# Allegro board GEN-LB-20261108-G1.brd
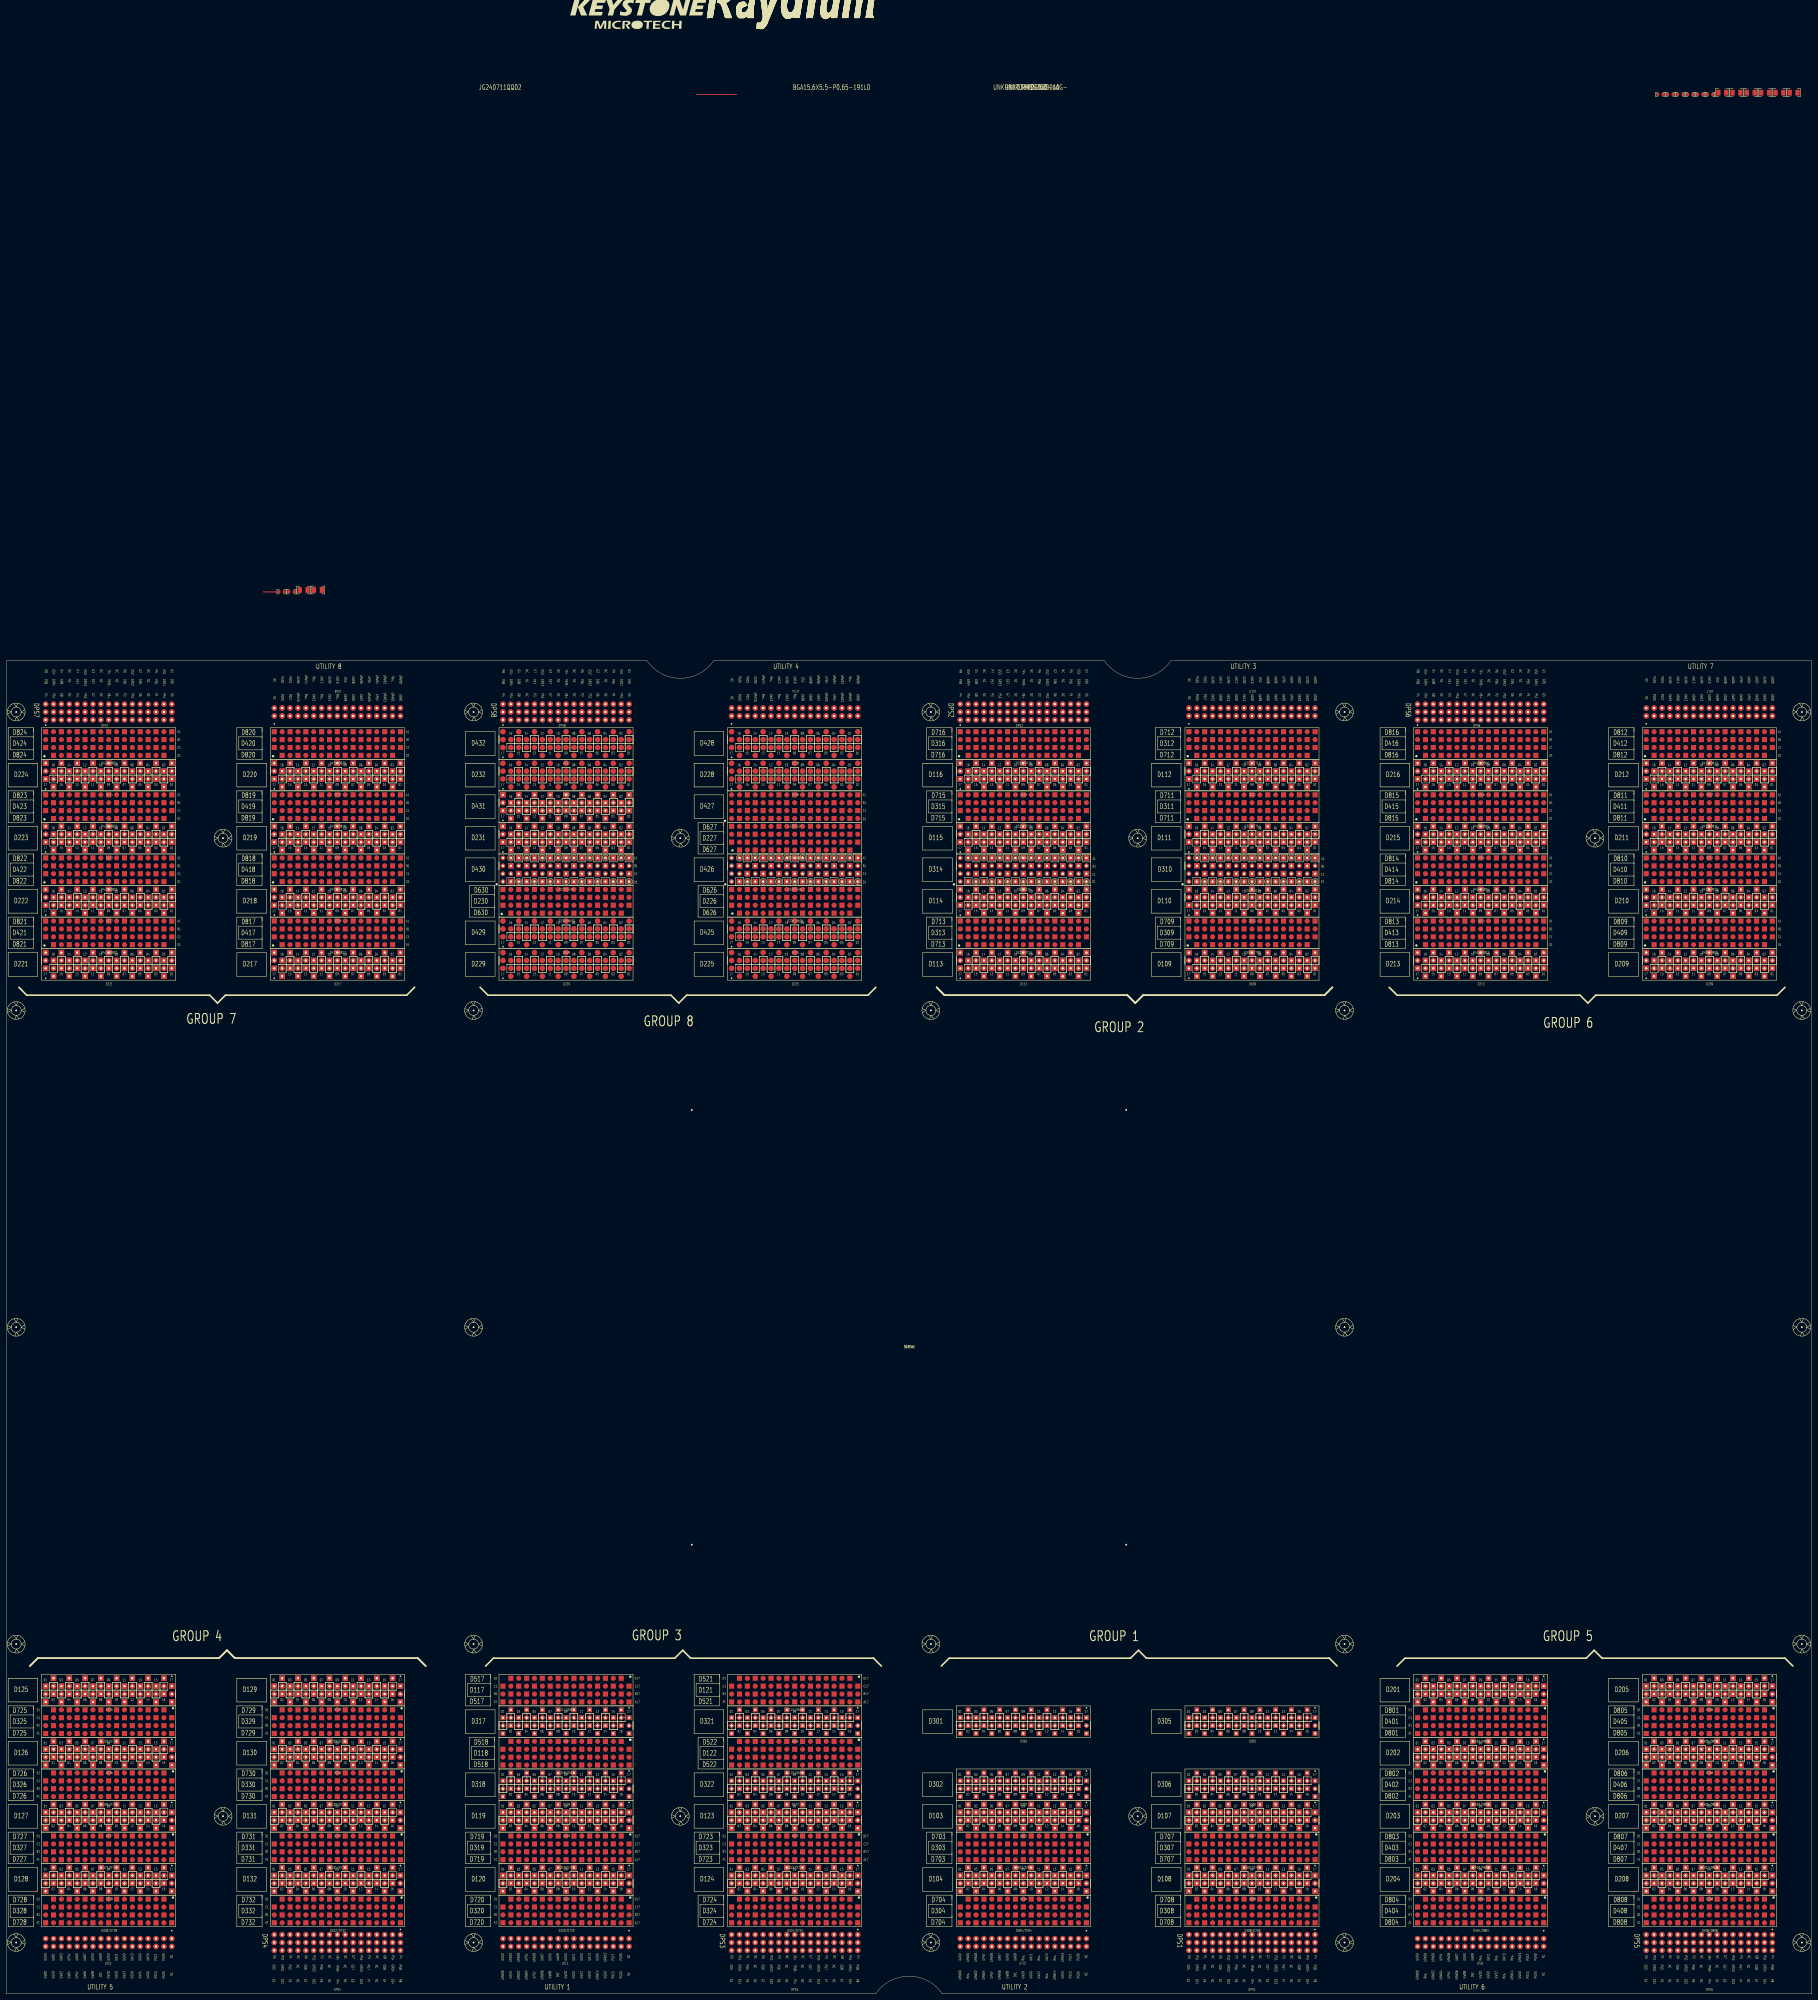
[diagram p0: board, top side]
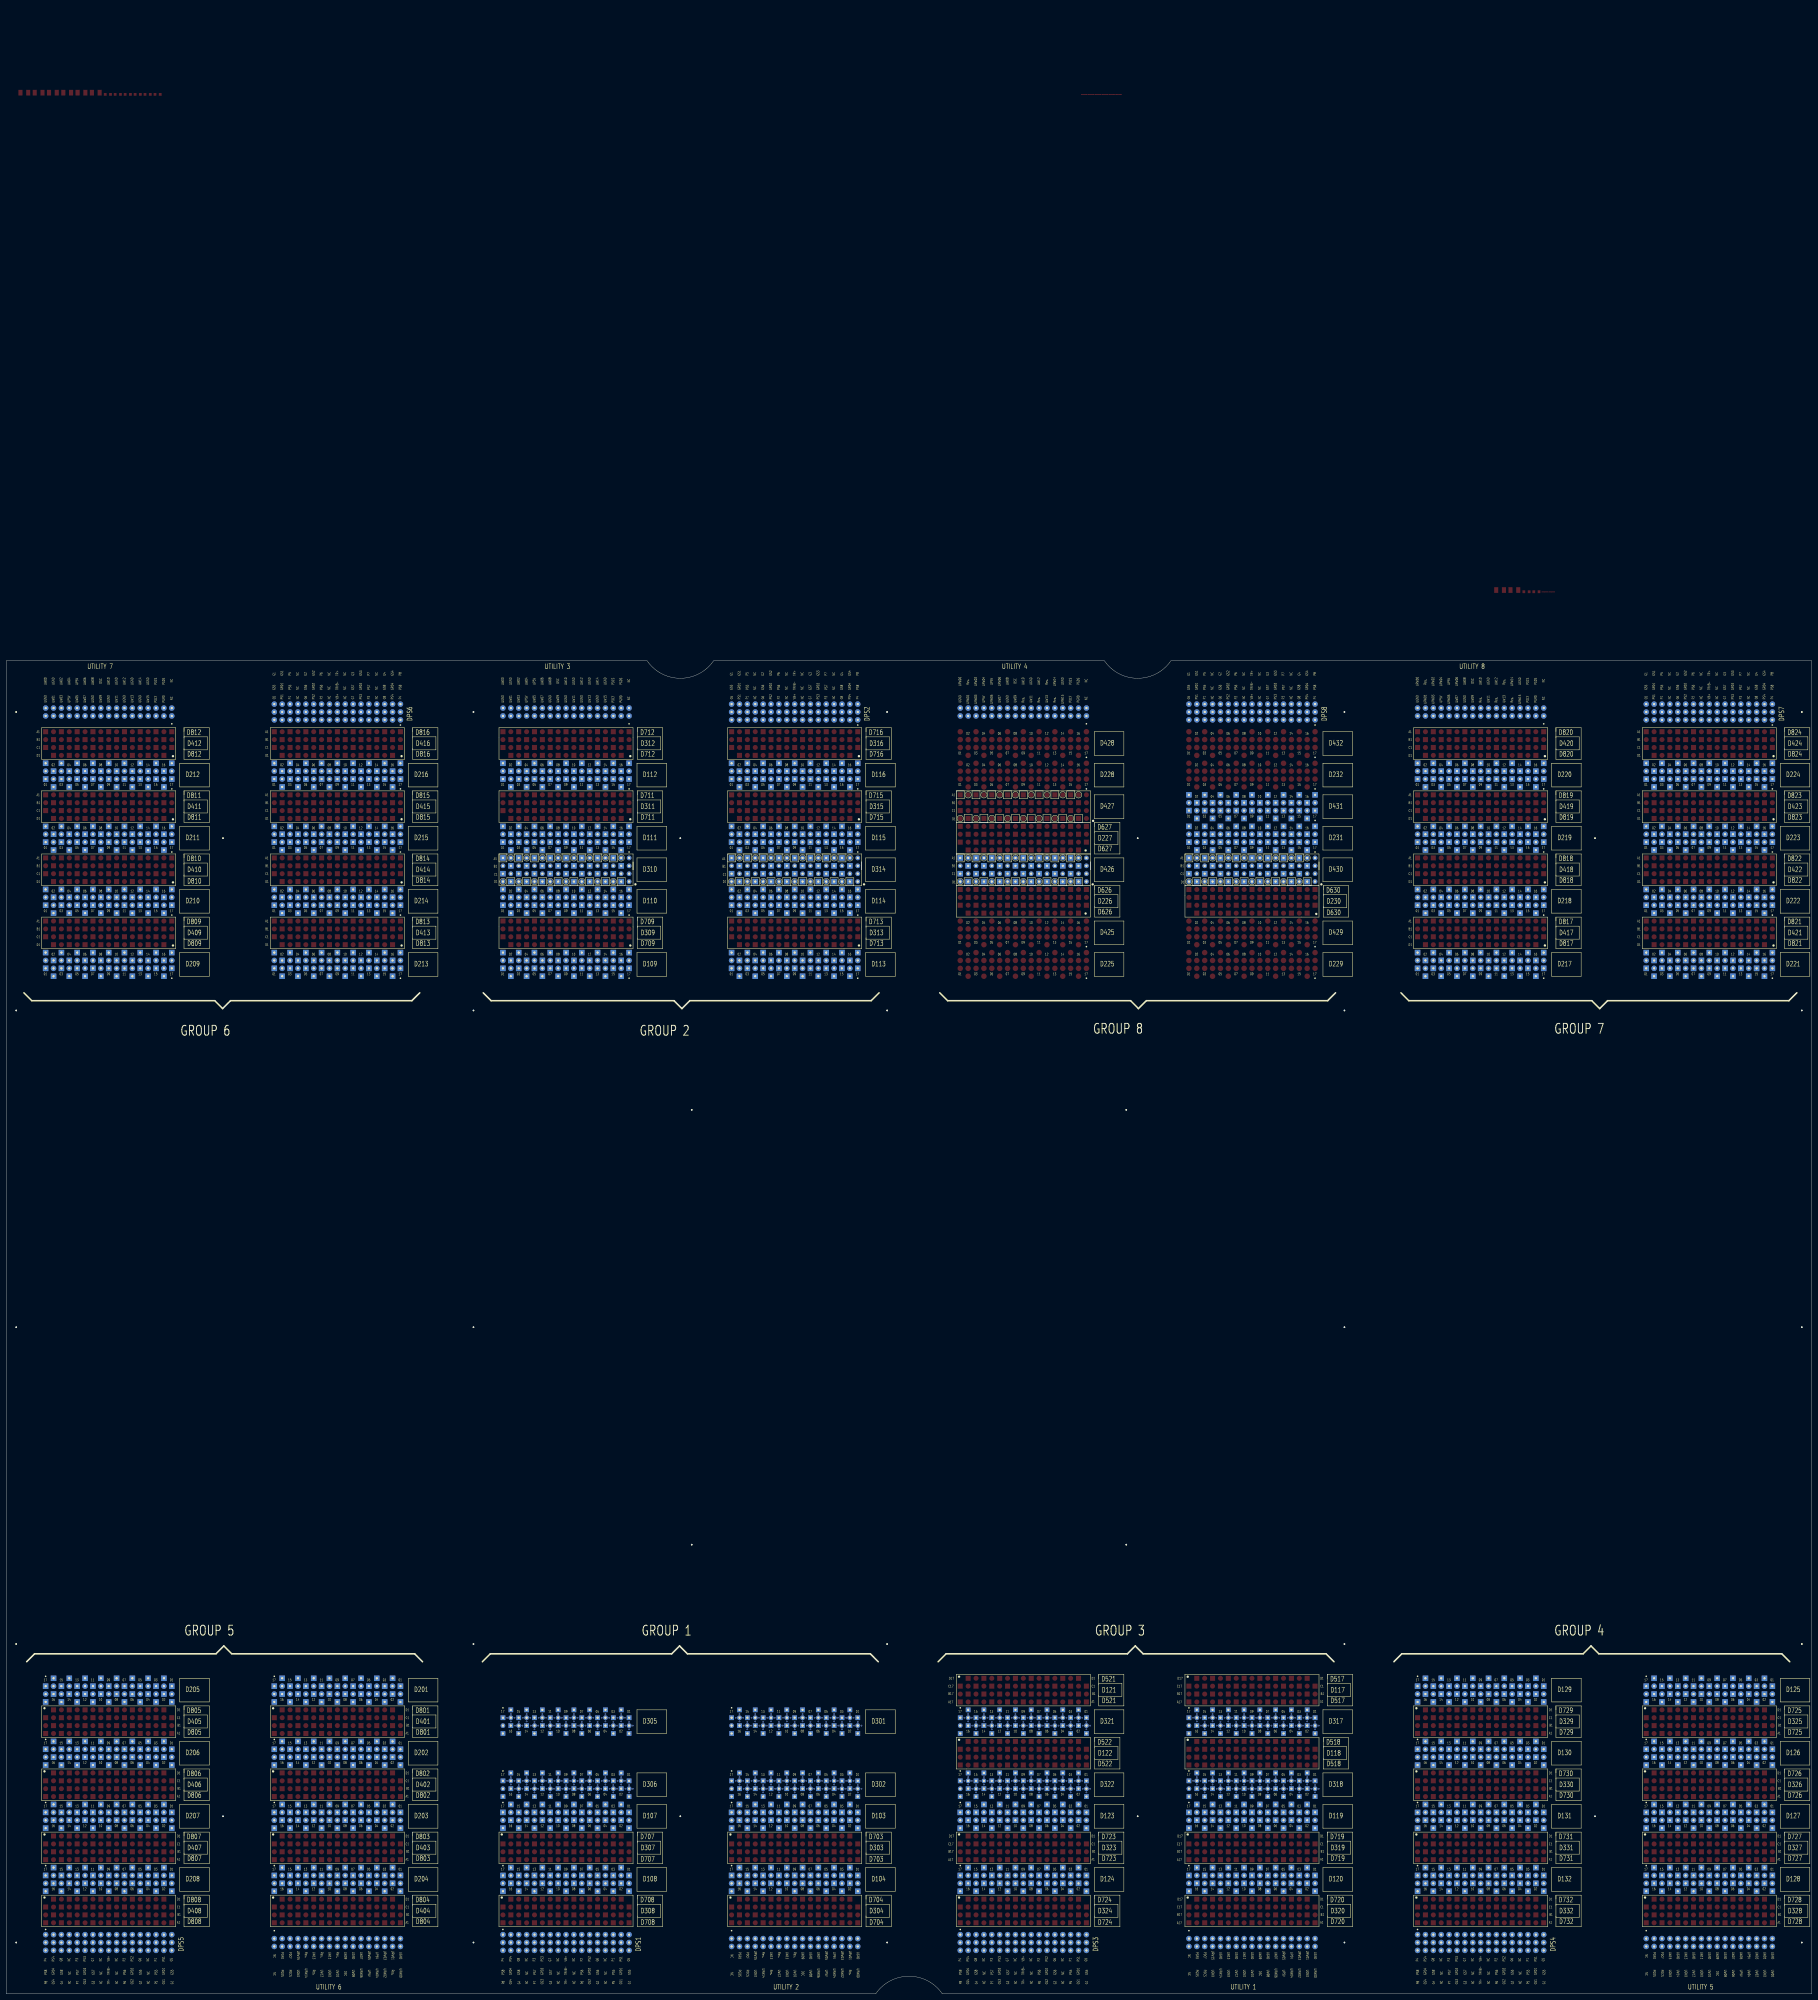
[diagram p1: board, bottom side, seen from below]

Outline 581.66 x 429.26 mm; copper layers: TOP, L02_DGND, L03_DIG, L04_DGND, L05_DIG, L06_DGND, L07_DIG, L08_DGND, L09_DIG, L10_DGND, L11_DPS, L12_DGND, L13_CBIT_5V, L14_DGND, L15_DPS, L16_DPS, L17_DGND, L18_DPS, L19_DGND, L20_DIG, L21_DGND, L22_DIG, L23_DGND, L24_DIG, L25_DGND, BOTTOM. Coordinates in mm from the lower left corner of the outline.

## Placement (name value [footprint] x y rotation side)
BGA15.6X5.5-P0.65-191LD  REF-CODE-CHIP  [CHIP_CODE]  265.72 614.04 0 top
CB1  0.1U-25-X-S6  [C0603]  532.89 611.63 0 top
CB2  10U-25-X7R-SA  [C1206]  562.02 612.18 0 top
CB3  0.1U-25-X-S6  [C0603]  539.3 611.63 0 top
CB4  10U-25-X7R-SA  [C1206]  566.62 612.18 0 top
CB5  0.1U-25-X-S6  [C0603]  542.5 611.63 0 top
CB6  10U-25-X7R-SA  [C1206]  571.22 612.18 0 top
CB7  0.1U-25-X-S6  [C0603]  545.7 611.63 0 top
CB8  10U-25-X7R-SA  [C1206]  575.83 612.18 0 top
CB9  0.1U-25-X-S6  [C0603]  548.91 611.63 0 top
CB10  10U-25-X7R-SA  [C1206]  552.81 612.18 0 top
CB11  0.1U-25-X-S6  [C0603]  88.71 451.48 0 top
CB12  10U-25-X7R-SA  [C1206]  95.81 452.03 0 top
CB13  0.1U-25-X-S6  [C0603]  91.91 451.48 0 top
CB14  10U-25-X7R-SA  [C1206]  100.42 452.03 0 top
CB15  0.1U-25-X-S6  [C0603]  536.09 611.63 0 top
CB16  10U-25-X7R-SA  [C1206]  557.41 612.18 0 top
CSDPS310  V93K_CSDPS_DPS32  [PG_VG93K_PF_DPS32_G2D310]  401.32 361.95 0 top
CSDPS314  V93K_CSDPS_DPS32  [PG_VG93K_PF_DPS32_G2D314]  327.66 361.95 0 top
CSDPS426  V93K_CSDPS  [PG_VG93K_PF_DPS32_G8D426]  254 361.95 0 top
CSDPS427  V93K_CSDPS_DPS32  [PG_VG93K_PF_DPS32_G8D427_ND]  254 382.27 0 top
CSDPS430  V93K_CSDPS_DPS32  [PG_VG93K_PF_DPS32_G8D430]  180.34 361.95 0 top
D103  V93K_CH  [PG_VG93K_F_G1D103]  327.66 57.15 0 top
D104  V93K_CH  [PG_VG93K_F_G1D104]  327.66 36.83 0 top
D107  V93K_CH  [PG_VG93K_F_G1D107]  401.32 57.15 0 top
D108  V93K_CH  [PG_VG93K_F_G1D108]  401.32 36.83 0 top
D109  V93K_CH  [PG_VG93K_F_G2D109]  401.32 331.47 0 top
D110  V93K_CH  [PG_VG93K_F_G2D110]  401.32 351.79 0 top
D111  V93K_CH  [PG_VG93K_F_G2D111]  401.32 372.11 0 top
D112  V93K_CH  [PG_VG93K_F_G2D112]  401.32 392.43 0 top
D113  V93K_CH  [PG_VG93K_F_G2D113]  327.66 331.47 0 top
D114  V93K_CH  [PG_VG93K_F_G2D114]  327.66 351.79 0 top
D115  V93K_CH  [PG_VG93K_F_G2D115]  327.66 372.11 0 top
D116  V93K_CH  [PG_VG93K_F_G2D116]  327.66 392.43 0 top
D117/D517  V93K_PS1600 HD  [PG_VG93K_F_HSM_G3D117_517_ND]  180.34 97.79 0 top
D118/D518  V93K_PS1600 HD  [PG_VG93K_F_HSM_G3D118_518_ND]  180.34 77.47 0 top
D119  V93K_CH  [PG_VG93K_F_G3D119]  180.34 57.15 0 top
D120  V93K_CH  [PG_VG93K_F_G3D120]  180.34 36.83 0 top
D121/D521  V93K_PS1600 HD  [PG_VG93K_F_HSM_G3D121_521_ND]  254 97.79 0 top
D122/D522  V93K_PS1600 HD  [PG_VG93K_F_HSM_G3D122_522_ND]  254 77.47 0 top
D123  V93K_CH  [PG_VG93K_F_G3D123]  254 57.15 0 top
D124  V93K_CH  [PG_VG93K_F_G3D124]  254 36.83 0 top
D125  V93K_CH  [PG_VG93K_F_G4D125]  33.02 97.79 0 top
D126  V93K_CH  [PG_VG93K_F_G4D126]  33.02 77.47 0 top
D127  V93K_CH  [PG_VG93K_F_G4D127]  33.02 57.15 0 top
D128  V93K_CH  [PG_VG93K_F_G4D128]  33.02 36.83 0 top
D129  V93K_CH  [PG_VG93K_F_G4D129]  106.68 97.79 0 top
D130  V93K_CH  [PG_VG93K_F_G4D130]  106.68 77.47 0 top
D131  V93K_CH  [PG_VG93K_F_G4D131]  106.68 57.15 0 top
D132  V93K_CH  [PG_VG93K_F_G4D132]  106.68 36.83 0 top
D201  V93K_CH  [PG_VG93K_F_G5D201]  474.98 97.79 0 top
D202  V93K_CH  [PG_VG93K_F_G5D202]  474.98 77.47 0 top
D203  V93K_CH  [PG_VG93K_F_G5D203]  474.98 57.15 0 top
D204  V93K_CH  [PG_VG93K_F_G5D204]  474.98 36.83 0 top
D205  V93K_CH  [PG_VG93K_F_G5D205]  548.64 97.79 0 top
D206  V93K_CH  [PG_VG93K_F_G5D206]  548.64 77.47 0 top
D207  V93K_CH  [PG_VG93K_F_G5D207]  548.64 57.15 0 top
D208  V93K_CH  [PG_VG93K_F_G5D208]  548.64 36.83 0 top
D209  V93K_CH  [PG_VG93K_F_G6D209]  548.64 331.47 0 top
D210  V93K_CH  [PG_VG93K_F_G6D210]  548.64 351.79 0 top
D211  V93K_CH  [PG_VG93K_F_G6D211]  548.64 372.11 0 top
D212  V93K_CH  [PG_VG93K_F_G6D212]  548.64 392.43 0 top
D213  V93K_CH  [PG_VG93K_F_G6D213]  474.98 331.47 0 top
D214  V93K_CH  [PG_VG93K_F_G6D214]  474.98 351.79 0 top
D215  V93K_CH  [PG_VG93K_F_G6D215]  474.98 372.11 0 top
D216  V93K_CH  [PG_VG93K_F_G6D216]  474.98 392.43 0 top
D217  V93K_CH  [PG_VG93K_F_G7D217]  106.68 331.47 0 top
D218  V93K_CH  [PG_VG93K_F_G7D218]  106.68 351.79 0 top
D219  V93K_CH  [PG_VG93K_F_G7D219]  106.68 372.11 0 top
D220  V93K_CH  [PG_VG93K_F_G7D220]  106.68 392.43 0 top
D221  V93K_CH  [PG_VG93K_F_G7D221]  33.02 331.47 0 top
D222  V93K_CH  [PG_VG93K_F_G7D222]  33.02 351.79 0 top
D223  V93K_CH  [PG_VG93K_F_G7D223]  33.02 372.11 0 top
D224  V93K_CH  [PG_VG93K_F_G7D224]  33.02 392.43 0 top
D225  V93K_CH_ND  [PG_VG93K_F_G8D225_ND]  254 331.47 0 top
D226/D626  V93K_PS1600 HD  [PG_VG93K_F_HSM_G8D226_626_ND]  254 351.79 0 top
D227/D627  V93K_PS1600 HD  [PG_VG93K_F_HSM_G8D227_627_ND]  254 372.11 0 top
D228  V93K_CH_ND  [PG_VG93K_F_G8D228_ND]  254 392.43 0 top
D229  V93K_CH_ND  [PG_VG93K_F_G8D229_ND]  180.34 331.47 0 top
D230/D630  V93K_PS1600 HD  [PG_VG93K_F_HSM_G8D230_630_ND]  180.34 351.79 0 top
D231  V93K_CH  [PG_VG93K_F_G8D231]  180.34 372.11 0 top
D232  V93K_CH_ND  [PG_VG93K_F_G8D232_ND]  180.34 392.43 0 top
D301  V93K_CH  [PG_VG93K_F_G1D301]  327.66 87.63 0 top
D302  V93K_CH  [PG_VG93K_F_G1D302]  327.66 67.31 0 top
D303/D703  V93K_PS1600 HD  [PG_VG93K_F_HSM_G1D303_703_ND]  327.66 46.99 0 top
D304/D704  V93K_PS1600 HD  [PG_VG93K_F_HSM_G1D304_704_ND]  327.66 26.67 0 top
D305  V93K_CH  [PG_VG93K_F_G1D305]  401.32 87.63 0 top
D306  V93K_CH  [PG_VG93K_F_G1D306]  401.32 67.31 0 top
D307/D707  V93K_PS1600 HD  [PG_VG93K_F_HSM_G1D307_707_ND]  401.32 46.99 0 top
D308/D708  V93K_PS1600 HD  [PG_VG93K_F_HSM_G1D308_708_ND]  401.32 26.67 0 top
D309/D709  V93K_PS1600 HD  [PG_VG93K_F_HSM_G2D309_709_ND]  401.32 341.63 0 top
D311/D711  V93K_PS1600 HD  [PG_VG93K_F_HSM_G2D311_711_ND]  401.32 382.27 0 top
D312/D712  V93K_PS1600 HD  [PG_VG93K_F_HSM_G2D312_712_ND]  401.32 402.59 0 top
D313/D713  V93K_PS1600 HD  [PG_VG93K_F_HSM_G2D313_713_ND]  327.66 341.63 0 top
D315/D715  V93K_PS1600 HD  [PG_VG93K_F_HSM_G2D315_715_ND]  327.66 382.27 0 top
D316/D716  V93K_PS1600 HD  [PG_VG93K_F_HSM_G2D316_716_ND]  327.66 402.59 0 top
D317  V93K_CH  [PG_VG93K_F_G3D317]  180.34 87.63 0 top
D318  V93K_CH  [PG_VG93K_F_G3D318]  180.34 67.31 0 top
D319/D719  V93K_PS1600 HD  [PG_VG93K_F_HSM_G3D319_719_ND]  180.34 46.99 0 top
D320/D720  V93K_PS1600 HD  [PG_VG93K_F_HSM_G3D320_720_ND]  180.34 26.67 0 top
D321  V93K_CH  [PG_VG93K_F_G3D321]  254 87.63 0 top
D322  V93K_CH  [PG_VG93K_F_G3D322]  254 67.31 0 top
D323/D723  V93K_PS1600 HD  [PG_VG93K_F_HSM_G3D323_723_ND]  254 46.99 0 top
D324/D724  V93K_PS1600 HD  [PG_VG93K_F_HSM_G3D324_724_ND]  254 26.67 0 top
D325/D725  V93K_PS1600 HD  [PG_VG93K_F_HSM_G4D325_725_ND]  33.02 87.63 0 top
D326/D726  V93K_PS1600 HD  [PG_VG93K_F_HSM_G4D326_726_ND]  33.02 67.31 0 top
D327/D727  V93K_PS1600 HD  [PG_VG93K_F_HSM_G4D327_727_ND]  33.02 46.99 0 top
D328/D728  V93K_PS1600 HD  [PG_VG93K_F_HSM_G4D328_728_ND]  33.02 26.67 0 top
D329/D729  V93K_PS1600 HD  [PG_VG93K_F_HSM_G4D329_729_ND]  106.68 87.63 0 top
D330/D730  V93K_PS1600 HD  [PG_VG93K_F_HSM_G4D330_730_ND]  106.68 67.31 0 top
D331/D731  V93K_PS1600 HD  [PG_VG93K_F_HSM_G4D331_731_ND]  106.68 46.99 0 top
D332/D732  V93K_PS1600 HD  [PG_VG93K_F_HSM_G4D332_732_ND]  106.68 26.67 0 top
D401/D801  V93K_PS1600 HD  [PG_VG93K_F_HSM_G5D401_801_ND]  474.98 87.63 0 top
D402/D802  V93K_PS1600 HD  [PG_VG93K_F_HSM_G5D402_802_ND]  474.98 67.31 0 top
D403/D803  V93K_PS1600 HD  [PG_VG93K_F_HSM_G5D403_803_ND]  474.98 46.99 0 top
D404/D804  V93K_PS1600 HD  [PG_VG93K_F_HSM_G5D404_804_ND]  474.98 26.67 0 top
D405/D805  V93K_PS1600 HD  [PG_VG93K_F_HSM_G5D405_805_ND]  548.64 87.63 0 top
D406/D806  V93K_PS1600 HD  [PG_VG93K_F_HSM_G5D406_806_ND]  548.64 67.31 0 top
D407/D807  V93K_PS1600 HD  [PG_VG93K_F_HSM_G5D407_807_ND]  548.64 46.99 0 top
D408/D808  V93K_PS1600 HD  [PG_VG93K_F_HSM_G5D408_808_ND]  548.64 26.67 0 top
D409/D809  V93K_PS1600 HD  [PG_VG93K_F_HSM_G6D409_809_ND]  548.64 341.63 0 top
D410/D810  V93K_PS1600 HD  [PG_VG93K_F_HSM_G6D410_810_ND]  548.64 361.95 0 top
D411/D811  V93K_PS1600 HD  [PG_VG93K_F_HSM_G6D411_811_ND]  548.64 382.27 0 top
D412/D812  V93K_PS1600 HD  [PG_VG93K_F_HSM_G6D412_812_ND]  548.64 402.59 0 top
D413/D813  V93K_PS1600 HD  [PG_VG93K_F_HSM_G6D413_813_ND]  474.98 341.63 0 top
D414/D814  V93K_PS1600 HD  [PG_VG93K_F_HSM_G6D414_814_ND]  474.98 361.95 0 top
D415/D815  V93K_PS1600 HD  [PG_VG93K_F_HSM_G6D415_815_ND]  474.98 382.27 0 top
D416/D816  V93K_PS1600 HD  [PG_VG93K_F_HSM_G6D416_816_ND]  474.98 402.59 0 top
D417/D817  V93K_PS1600 HD  [PG_VG93K_F_HSM_G7D417_817_ND]  106.68 341.63 0 top
D418/D818  V93K_PS1600 HD  [PG_VG93K_F_HSM_G7D418_818_ND]  106.68 361.95 0 top
D419/D819  V93K_PS1600 HD  [PG_VG93K_F_HSM_G7D419_819_ND]  106.68 382.27 0 top
D420/D820  V93K_PS1600 HD  [PG_VG93K_F_HSM_G7D420_820_ND]  106.68 402.59 0 top
D421/D821  V93K_PS1600 HD  [PG_VG93K_F_HSM_G7D421_821_ND]  33.02 341.63 0 top
D422/D822  V93K_PS1600 HD  [PG_VG93K_F_HSM_G7D422_822_ND]  33.02 361.95 0 top
D423/D823  V93K_PS1600 HD  [PG_VG93K_F_HSM_G7D423_823_ND]  33.02 382.27 0 top
D424/D824  V93K_PS1600 HD  [PG_VG93K_F_HSM_G7D424_824_ND]  33.02 402.59 0 top
D425  V93K_CH_ND  [PG_VG93K_F_G8D425_ND]  254 341.63 0 top
D428  V93K_CH_ND  [PG_VG93K_F_G8D428_ND]  254 402.59 0 top
D429  V93K_CH_ND  [PG_VG93K_F_G8D429_ND]  180.34 341.63 0 top
D431  V93K_CH  [PG_VG93K_F_G8D431]  180.34 382.27 0 top
D432  V93K_CH_ND  [PG_VG93K_F_G8D432_ND]  180.34 402.59 0 top
DPS1  V93K_DPS  [PG_VG93K_F_G1DPS1]  401.32 16.51 0 top
DPS2  V93K_DPS  [PG_VG93K_F_G2DPS2]  327.66 412.75 0 top
DPS3  V93K_DPS  [PG_VG93K_F_G3DPS3]  254 16.51 0 top
DPS4  V93K_DPS  [PG_VG93K_F_G4DPS4]  106.68 16.51 0 top
DPS5  V93K_DPS  [PG_VG93K_F_G5DPS5]  548.64 16.51 0 top
DPS6  V93K_DPS  [PG_VG93K_F_G6DPS6]  474.98 412.75 0 top
DPS7  V93K_DPS  [PG_VG93K_F_G7DPS7]  33.02 412.75 0 top
DPS8  V93K_DPS  [PG_VG93K_F_G8DPS8]  180.34 412.75 0 top
JG240711QQ02  REF-CODE-SOCKET  [SOCKET_CODE]  158.97 614.04 0 top
LOGO1  -  [LOGO_KT_KSMT]  200.55 637.03 0 top
LOGO2  LOGO_RD_Rad  [LOGO_RD_RAD]  252.59 640.7 0 top
NOREF  -  []  87.86 451.03 90 top
NOREF#2  -  []  532.04 611.18 90 top
NOREF#3  -  []  548.06 611.18 90 top
NOREF#4  -  []  538.45 611.18 90 top
NOREF#5  -  []  535.24 611.18 90 top
NOREF#6  -  []  91.06 451.03 90 top
NOREF#7  -  []  541.65 611.18 90 top
NOREF#8  -  []  544.85 611.18 90 top
RM85260  REF-CODE-CHIP  [CHIP_CODE]  330.95 614.04 0 top
SB1  SHORT  [DEFAULT_SHORT_SMALL]  223.34 611.56 0 top
SB13  SHORT  [DEFAULT_SHORT_SMALL]  225.54 611.56 0 top
SB14  SHORT  [DEFAULT_SHORT_SMALL]  227.75 611.56 0 top
SB15  SHORT  [DEFAULT_SHORT_SMALL]  229.95 611.56 0 top
SB16  SHORT  [DEFAULT_SHORT_SMALL]  232.15 611.56 0 top
SB17  SHORT  [DEFAULT_SHORT_SMALL]  83.8 451.41 0 top
SB18  SHORT  [DEFAULT_SHORT_SMALL]  86 451.41 0 top
SB19  SHORT  [DEFAULT_SHORT_SMALL]  234.36 611.56 0 top
SCREW1  V93KMFHOLE  [PG_VG93K_F_FULLOUTLINE]  290.83 214.63 0 top
UNK038RD-E200A0  REF-CODE-PCB  [PCB_CODE]  330.34 614.04 0 top
UNK980RD-E200A0-1AG-  REF-CODE-PCB  [PCB_CODE]  329.73 614.04 0 top
UTL1  V93K_UTL  [PG_VG93K_F_G3UTI1]  180.34 16.51 0 top
UTL2  V93K_UTL  [PG_VG93K_F_G1UTI2]  327.66 16.51 0 top
UTL3  V93K_UTL  [PG_VG93K_F_G2UTI3]  401.32 412.75 0 top
UTL4  V93K_UTL  [PG_VG93K_F_G8UTI4]  254 412.75 0 top
UTL5  V93K_UTL  [PG_VG93K_F_G4UTI5]  33.02 16.51 0 top
UTL6  V93K_UTL  [PG_VG93K_F_G5UTI6]  474.98 16.51 0 top
UTL7  V93K_UTL  [PG_VG93K_F_G6UTI7]  548.64 412.75 0 top
UTL8  V93K_UTL  [PG_VG93K_F_G7UTI8]  106.68 412.75 0 top

## Library data of the parts
BGA15.6X5.5-P0.65-191LD RM85260 = REF-CODE-CHIP
CB1 CB3 CB5 CB7 CB9 CB11 CB13 CB15 = 0.1U-25-X-S6: User Part Number: PNXXXXXXXXXX; Tolerance: TOL
CB2 CB4 CB6 CB8 CB10 CB12 CB14 CB16 = 10U-25-X7R-SA: User Part Number: PNXXXXXXXXXX; Tolerance: TOL
CSDPS310 CSDPS314 = V93K_CSDPS_DPS32: Tolerance: TOL; User Part Number: PNXXXXXXXXXX
CSDPS426 = V93K_CSDPS_A: User Part Number: PNXXXXXXXXXX; Tolerance: TOL
CSDPS427 CSDPS430 = V93K_CSDPS_DPS32: User Part Number: PNXXXXXXXXXX; Tolerance: TOL
D103 D104 D107-D116 D119 D120 D123-D132 D201-D225 D228 D229 D231 D232 D301 D302 D305 D306 D317 D318 D321 D322 D425 D428 D429 D431 D432 = V93K_CH: Tolerance: TOL; User Part Number: PNXXXXXXXXXX
D117/D517 D118/D518 D121/D521 D122/D522 D226/D626 D227/D627 D230/D630 D303/D703 D304/D704 D307/D707 D308/D708 D309/D709 D311/D711 D312/D712 D313/D713 D315/D715 D316/D716 D319/D719 D320/D720 D323/D723 D324/D724 D325/D725 D326/D726 D327/D727 D328/D728 D329/D729 D330/D730 D331/D731 D332/D732 D401/D801 D402/D802 D403/D803 D404/D804 D405/D805 D406/D806 D407/D807 D408/D808 D409/D809 D410/D810 D411/D811 D412/D812 D413/D813 D414/D814 D415/D815 D416/D816 D417/D817 D418/D818 D419/D819 D420/D820 D421/D821 D422/D822 D423/D823 D424/D824 = V93K_PS1600_HD: User Part Number: PNXXXXXXXXXX; Tolerance: TOL
DPS1-DPS8 = V93K_DPS: Tolerance: TOL; User Part Number: PNXXXXXXXXXX
JG240711QQ02 = REF-CODE-SOCKET
LOGO1 = LOGO_KT_KSMT
LOGO2 = LOGO_RD_Rad
SB1 SB13-SB19 = SHORT: User Part Number: PNXXXXXXXXXX; Tolerance: TOL
SCREW1 = V93KMFHOLE: Tolerance: TOL; User Part Number: PNXXXXXXXXXX
UNK038RD-E200A0 UNK980RD-E200A0-1AG- = REF-CODE-PCB
UTL1-UTL8 = V93K_UTL: User Part Number: PNXXXXXXXXXX; Tolerance: TOL

## Footprints (pads in the part's own frame, mm; a bottom-side part is the same pattern mirrored in y, then rotated)
C0603
  rect 0.889x0.889 smd: 1(-0.85,0) 2(0.85,0)
C1206
  rect 1.321x1.829 smd: 1(-1.25,0) 2(1.25,0)
CHIP_CODE
  round 0.051 smd: 1(0,0)
DEFAULT_SHORT_SMALL
  custom 0.07x0.07 smd: 1(-0.5,0) 2(0.5,0)
LOGO_KT_KSMT
  round 0.051 smd: 1(-0.711,-0.711)
LOGO_RD_RAD
  round 0.051 smd: 1(-0.711,-0.711)
PCB_CODE
  round 0.051 smd: 1(0,0)
PG_VG93K_F_FULLOUTLINE
  round 0.508 hole 3.2 unplated: (-287.604,198.12) (-287.604,102.006) (-287.604,0) (-287.604,-102.006) (-287.604,-198.12) (-220.98,157.48) (-220.98,-157.48) (-140.276,198.12) (-140.276,102.006) (-140.276,0) (-140.276,-102.006) (-140.276,-198.12) (-73.66,157.48) (-73.66,-157.48) (7.044,198.12) (7.044,102.006) (7.044,-102.006) (7.044,-198.12) (73.66,157.48) (73.66,-157.48) (140.304,198.12) (140.304,102.006) (140.304,0) (140.304,-102.006) (140.304,-198.12) (220.98,157.48) (220.98,-157.48) (287.604,198.12) (287.604,102.006) (287.604,0) (287.604,-102.006) (287.604,-198.12)
  round 0.508 hole 6 unplated: (-70,70) (-70,-70) (70,70) (70,-70)
PG_VG93K_F_G1D103
  round 1.778 hole 0.711: 01(-20.32,-1.27) 02(-17.78,1.27) 03(-15.24,-1.27) 04(-12.7,1.27) 05(-10.16,-1.27) 06(-7.62,1.27) 07(-5.08,-1.27) 08(-2.54,1.27) 09(0,-1.27) 10(2.54,1.27) 11(5.08,-1.27) 12(7.62,1.27) 13(10.16,-1.27) 14(12.7,1.27) 15(15.24,-1.27) 16(17.78,1.27) 17(20.32,-1.27)
  rect 1.778x1.778 hole 0.711: A1(-20.32,-3.81) A2(-17.78,-1.27) A3(-15.24,-3.81) A4(-12.7,-1.27) A5(-10.16,-3.81) A6(-7.62,-1.27) A7(-5.08,-3.81) A8(-2.54,-1.27) A9(0,-3.81) A10(2.54,-1.27) A11(5.08,-3.81) A12(7.62,-1.27) A13(10.16,-3.81) A14(12.7,-1.27) A15(15.24,-3.81) A16(17.78,-1.27) A17(20.32,-3.81) B1(-20.32,1.27) B2(-17.78,3.81) B3(-15.24,1.27) B4(-12.7,3.81) B5(-10.16,1.27) B6(-7.62,3.81) B7(-5.08,1.27) B8(-2.54,3.81) B9(0,1.27) B10(2.54,3.81) B11(5.08,1.27) B12(7.62,3.81) B13(10.16,1.27) B14(12.7,3.81) B15(15.24,1.27) B16(17.78,3.81) B17(20.32,1.27)
PG_VG93K_F_G1D104
  round 1.778 hole 0.711: 01(-20.32,-1.27) 02(-17.78,1.27) 03(-15.24,-1.27) 04(-12.7,1.27) 05(-10.16,-1.27) 06(-7.62,1.27) 07(-5.08,-1.27) 08(-2.54,1.27) 09(0,-1.27) 10(2.54,1.27) 11(5.08,-1.27) 12(7.62,1.27) 13(10.16,-1.27) 14(12.7,1.27) 15(15.24,-1.27) 16(17.78,1.27) 17(20.32,-1.27)
  rect 1.778x1.778 hole 0.711: A1(-20.32,-3.81) A2(-17.78,-1.27) A3(-15.24,-3.81) A4(-12.7,-1.27) A5(-10.16,-3.81) A6(-7.62,-1.27) A7(-5.08,-3.81) A8(-2.54,-1.27) A9(0,-3.81) A10(2.54,-1.27) A11(5.08,-3.81) A12(7.62,-1.27) A13(10.16,-3.81) A14(12.7,-1.27) A15(15.24,-3.81) A16(17.78,-1.27) A17(20.32,-3.81) B1(-20.32,1.27) B2(-17.78,3.81) B3(-15.24,1.27) B4(-12.7,3.81) B5(-10.16,1.27) B6(-7.62,3.81) B7(-5.08,1.27) B8(-2.54,3.81) B9(0,1.27) B10(2.54,3.81) B11(5.08,1.27) B12(7.62,3.81) B13(10.16,1.27) B14(12.7,3.81) B15(15.24,1.27) B16(17.78,3.81) B17(20.32,1.27)
PG_VG93K_F_G1D107
  round 1.778 hole 0.711: 01(-20.32,-1.27) 02(-17.78,1.27) 03(-15.24,-1.27) 04(-12.7,1.27) 05(-10.16,-1.27) 06(-7.62,1.27) 07(-5.08,-1.27) 08(-2.54,1.27) 09(0,-1.27) 10(2.54,1.27) 11(5.08,-1.27) 12(7.62,1.27) 13(10.16,-1.27) 14(12.7,1.27) 15(15.24,-1.27) 16(17.78,1.27) 17(20.32,-1.27)
  rect 1.778x1.778 hole 0.711: A1(-20.32,-3.81) A2(-17.78,-1.27) A3(-15.24,-3.81) A4(-12.7,-1.27) A5(-10.16,-3.81) A6(-7.62,-1.27) A7(-5.08,-3.81) A8(-2.54,-1.27) A9(0,-3.81) A10(2.54,-1.27) A11(5.08,-3.81) A12(7.62,-1.27) A13(10.16,-3.81) A14(12.7,-1.27) A15(15.24,-3.81) A16(17.78,-1.27) A17(20.32,-3.81) B1(-20.32,1.27) B2(-17.78,3.81) B3(-15.24,1.27) B4(-12.7,3.81) B5(-10.16,1.27) B6(-7.62,3.81) B7(-5.08,1.27) B8(-2.54,3.81) B9(0,1.27) B10(2.54,3.81) B11(5.08,1.27) B12(7.62,3.81) B13(10.16,1.27) B14(12.7,3.81) B15(15.24,1.27) B16(17.78,3.81) B17(20.32,1.27)
PG_VG93K_F_G1D108
  round 1.778 hole 0.711: 01(-20.32,-1.27) 02(-17.78,1.27) 03(-15.24,-1.27) 04(-12.7,1.27) 05(-10.16,-1.27) 06(-7.62,1.27) 07(-5.08,-1.27) 08(-2.54,1.27) 09(0,-1.27) 10(2.54,1.27) 11(5.08,-1.27) 12(7.62,1.27) 13(10.16,-1.27) 14(12.7,1.27) 15(15.24,-1.27) 16(17.78,1.27) 17(20.32,-1.27)
  rect 1.778x1.778 hole 0.711: A1(-20.32,-3.81) A2(-17.78,-1.27) A3(-15.24,-3.81) A4(-12.7,-1.27) A5(-10.16,-3.81) A6(-7.62,-1.27) A7(-5.08,-3.81) A8(-2.54,-1.27) A9(0,-3.81) A10(2.54,-1.27) A11(5.08,-3.81) A12(7.62,-1.27) A13(10.16,-3.81) A14(12.7,-1.27) A15(15.24,-3.81) A16(17.78,-1.27) A17(20.32,-3.81) B1(-20.32,1.27) B2(-17.78,3.81) B3(-15.24,1.27) B4(-12.7,3.81) B5(-10.16,1.27) B6(-7.62,3.81) B7(-5.08,1.27) B8(-2.54,3.81) B9(0,1.27) B10(2.54,3.81) B11(5.08,1.27) B12(7.62,3.81) B13(10.16,1.27) B14(12.7,3.81) B15(15.24,1.27) B16(17.78,3.81) B17(20.32,1.27)
PG_VG93K_F_G1D301
  round 1.524 hole 0.711: 01(-20.32,-1.27) 02(-17.78,1.27) 03(-15.24,-1.27) 04(-12.7,1.27) 05(-10.16,-1.27) 06(-7.62,1.27) 07(-5.08,-1.27) 08(-2.54,1.27) 09(0,-1.27) 10(2.54,1.27) 11(5.08,-1.27) 12(7.62,1.27) 13(10.16,-1.27) 14(12.7,1.27) 15(15.24,-1.27) 16(17.78,1.27) 17(20.32,-1.27)
  rect 1.524x1.524 hole 0.711: A1(-20.32,-3.81) A2(-17.78,-1.27) A3(-15.24,-3.81) A4(-12.7,-1.27) A5(-10.16,-3.81) A6(-7.62,-1.27) A7(-5.08,-3.81) A8(-2.54,-1.27) A9(0,-3.81) A10(2.54,-1.27) A11(5.08,-3.81) A12(7.62,-1.27) A13(10.16,-3.81) A14(12.7,-1.27) A15(15.24,-3.81) A16(17.78,-1.27) A17(20.32,-3.81) B1(-20.32,1.27) B2(-17.78,3.81) B3(-15.24,1.27) B4(-12.7,3.81) B5(-10.16,1.27) B6(-7.62,3.81) B7(-5.08,1.27) B8(-2.54,3.81) B9(0,1.27) B10(2.54,3.81) B11(5.08,1.27) B12(7.62,3.81) B13(10.16,1.27) B14(12.7,3.81) B15(15.24,1.27) B16(17.78,3.81) B17(20.32,1.27)
PG_VG93K_F_G1D302
  round 1.524 hole 0.711: 01(-20.32,-1.27) 02(-17.78,1.27) 03(-15.24,-1.27) 04(-12.7,1.27) 05(-10.16,-1.27) 06(-7.62,1.27) 07(-5.08,-1.27) 08(-2.54,1.27) 09(0,-1.27) 10(2.54,1.27) 11(5.08,-1.27) 12(7.62,1.27) 13(10.16,-1.27) 14(12.7,1.27) 15(15.24,-1.27) 16(17.78,1.27) 17(20.32,-1.27)
  rect 1.524x1.524 hole 0.711: A1(-20.32,-3.81) A2(-17.78,-1.27) A3(-15.24,-3.81) A4(-12.7,-1.27) A5(-10.16,-3.81) A6(-7.62,-1.27) A7(-5.08,-3.81) A8(-2.54,-1.27) A9(0,-3.81) A10(2.54,-1.27) A11(5.08,-3.81) A12(7.62,-1.27) A13(10.16,-3.81) A14(12.7,-1.27) A15(15.24,-3.81) A16(17.78,-1.27) A17(20.32,-3.81) B1(-20.32,1.27) B2(-17.78,3.81) B3(-15.24,1.27) B4(-12.7,3.81) B5(-10.16,1.27) B6(-7.62,3.81) B7(-5.08,1.27) B8(-2.54,3.81) B9(0,1.27) B10(2.54,3.81) B11(5.08,1.27) B12(7.62,3.81) B13(10.16,1.27) B14(12.7,3.81) B15(15.24,1.27) B16(17.78,3.81) B17(20.32,1.27)
PG_VG93K_F_G1D305
  round 1.524 hole 0.711: 01(-20.32,-1.27) 02(-17.78,1.27) 03(-15.24,-1.27) 04(-12.7,1.27) 05(-10.16,-1.27) 06(-7.62,1.27) 07(-5.08,-1.27) 08(-2.54,1.27) 09(0,-1.27) 10(2.54,1.27) 11(5.08,-1.27) 12(7.62,1.27) 13(10.16,-1.27) 14(12.7,1.27) 15(15.24,-1.27) 16(17.78,1.27) 17(20.32,-1.27)
  rect 1.524x1.524 hole 0.711: A1(-20.32,-3.81) A2(-17.78,-1.27) A3(-15.24,-3.81) A4(-12.7,-1.27) A5(-10.16,-3.81) A6(-7.62,-1.27) A7(-5.08,-3.81) A8(-2.54,-1.27) A9(0,-3.81) A10(2.54,-1.27) A11(5.08,-3.81) A12(7.62,-1.27) A13(10.16,-3.81) A14(12.7,-1.27) A15(15.24,-3.81) A16(17.78,-1.27) A17(20.32,-3.81) B1(-20.32,1.27) B2(-17.78,3.81) B3(-15.24,1.27) B4(-12.7,3.81) B5(-10.16,1.27) B6(-7.62,3.81) B7(-5.08,1.27) B8(-2.54,3.81) B9(0,1.27) B10(2.54,3.81) B11(5.08,1.27) B12(7.62,3.81) B13(10.16,1.27) B14(12.7,3.81) B15(15.24,1.27) B16(17.78,3.81) B17(20.32,1.27)
PG_VG93K_F_G1D306
  round 1.524 hole 0.711: 01(-20.32,-1.27) 02(-17.78,1.27) 03(-15.24,-1.27) 04(-12.7,1.27) 05(-10.16,-1.27) 06(-7.62,1.27) 07(-5.08,-1.27) 08(-2.54,1.27) 09(0,-1.27) 10(2.54,1.27) 11(5.08,-1.27) 12(7.62,1.27) 13(10.16,-1.27) 14(12.7,1.27) 15(15.24,-1.27) 16(17.78,1.27) 17(20.32,-1.27)
  rect 1.524x1.524 hole 0.711: A1(-20.32,-3.81) A2(-17.78,-1.27) A3(-15.24,-3.81) A4(-12.7,-1.27) A5(-10.16,-3.81) A6(-7.62,-1.27) A7(-5.08,-3.81) A8(-2.54,-1.27) A9(0,-3.81) A10(2.54,-1.27) A11(5.08,-3.81) A12(7.62,-1.27) A13(10.16,-3.81) A14(12.7,-1.27) A15(15.24,-3.81) A16(17.78,-1.27) A17(20.32,-3.81) B1(-20.32,1.27) B2(-17.78,3.81) B3(-15.24,1.27) B4(-12.7,3.81) B5(-10.16,1.27) B6(-7.62,3.81) B7(-5.08,1.27) B8(-2.54,3.81) B9(0,1.27) B10(2.54,3.81) B11(5.08,1.27) B12(7.62,3.81) B13(10.16,1.27) B14(12.7,3.81) B15(15.24,1.27) B16(17.78,3.81) B17(20.32,1.27)
PG_VG93K_F_G1DPS1
  round 1.778 hole 0.711: A01(-20.32,-2.54) A02(-17.78,-2.54) A03(-15.24,-2.54) A04(-12.7,-2.54) A05(-10.16,-2.54) A06(-7.62,-2.54) A07(-5.08,-2.54) A08(-2.54,-2.54) A09(0,-2.54) A10(2.54,-2.54) A11(5.08,-2.54) A12(7.62,-2.54) A13(10.16,-2.54) A14(12.7,-2.54) A15(15.24,-2.54) A16(17.78,-2.54) A17(20.32,-2.54) B01(-20.32,0) B02(-17.78,0) B03(-15.24,0) B04(-12.7,0) B05(-10.16,0) B06(-7.62,0) B07(-5.08,0) B08(-2.54,0) B09(0,0) B10(2.54,0) B11(5.08,0) B12(7.62,0) B13(10.16,0) B14(12.7,0) B15(15.24,0) B16(17.78,0) B17(20.32,0) C01(-20.32,2.54) C02(-17.78,2.54) C03(-15.24,2.54) C04(-12.7,2.54) C05(-10.16,2.54) C06(-7.62,2.54) C07(-5.08,2.54) C08(-2.54,2.54) C09(0,2.54) C10(2.54,2.54) C11(5.08,2.54) C12(7.62,2.54) C13(10.16,2.54) C14(12.7,2.54) C15(15.24,2.54) C16(17.78,2.54) C17(20.32,2.54)
PG_VG93K_F_G1UTI2
  round 1.778 hole 0.711: A01(-20.32,-1.27) A02(-17.78,-1.27) A03(-15.24,-1.27) A04(-12.7,-1.27) A05(-10.16,-1.27) A06(-7.62,-1.27) A07(-5.08,-1.27) A08(-2.54,-1.27) A09(0,-1.27) A10(2.54,-1.27) A11(5.08,-1.27) A12(7.62,-1.27) A13(10.16,-1.27) A14(12.7,-1.27) A15(15.24,-1.27) A16(17.78,-1.27) A17(20.32,-1.27) B01(-20.32,1.27) B02(-17.78,1.27) B03(-15.24,1.27) B04(-12.7,1.27) B05(-10.16,1.27) B06(-7.62,1.27) B07(-5.08,1.27) B08(-2.54,1.27) B09(0,1.27) B10(2.54,1.27) B11(5.08,1.27) B12(7.62,1.27) B13(10.16,1.27) B14(12.7,1.27) B15(15.24,1.27) B16(17.78,1.27) B17(20.32,1.27)
PG_VG93K_F_G2D109
  round 1.778 hole 0.711: 01(20.32,1.27) 02(17.78,-1.27) 03(15.24,1.27) 04(12.7,-1.27) 05(10.16,1.27) 06(7.62,-1.27) 07(5.08,1.27) 08(2.54,-1.27) 09(0,1.27) 10(-2.54,-1.27) 11(-5.08,1.27) 12(-7.62,-1.27) 13(-10.16,1.27) 14(-12.7,-1.27) 15(-15.24,1.27) 16(-17.78,-1.27) 17(-20.32,1.27)
  rect 1.778x1.778 hole 0.711: A1(20.32,3.81) A2(17.78,1.27) A3(15.24,3.81) A4(12.7,1.27) A5(10.16,3.81) A6(7.62,1.27) A7(5.08,3.81) A8(2.54,1.27) A9(0,3.81) A10(-2.54,1.27) A11(-5.08,3.81) A12(-7.62,1.27) A13(-10.16,3.81) A14(-12.7,1.27) A15(-15.24,3.81) A16(-17.78,1.27) A17(-20.32,3.81) B1(20.32,-1.27) B2(17.78,-3.81) B3(15.24,-1.27) B4(12.7,-3.81) B5(10.16,-1.27) B6(7.62,-3.81) B7(5.08,-1.27) B8(2.54,-3.81) B9(0,-1.27) B10(-2.54,-3.81) B11(-5.08,-1.27) B12(-7.62,-3.81) B13(-10.16,-1.27) B14(-12.7,-3.81) B15(-15.24,-1.27) B16(-17.78,-3.81) B17(-20.32,-1.27)
PG_VG93K_F_G2D110
  round 1.778 hole 0.711: 01(20.32,1.27) 02(17.78,-1.27) 03(15.24,1.27) 04(12.7,-1.27) 05(10.16,1.27) 06(7.62,-1.27) 07(5.08,1.27) 08(2.54,-1.27) 09(0,1.27) 10(-2.54,-1.27) 11(-5.08,1.27) 12(-7.62,-1.27) 13(-10.16,1.27) 14(-12.7,-1.27) 15(-15.24,1.27) 16(-17.78,-1.27) 17(-20.32,1.27)
  rect 1.778x1.778 hole 0.711: A1(20.32,3.81) A2(17.78,1.27) A3(15.24,3.81) A4(12.7,1.27) A5(10.16,3.81) A6(7.62,1.27) A7(5.08,3.81) A8(2.54,1.27) A9(0,3.81) A10(-2.54,1.27) A11(-5.08,3.81) A12(-7.62,1.27) A13(-10.16,3.81) A14(-12.7,1.27) A15(-15.24,3.81) A16(-17.78,1.27) A17(-20.32,3.81) B1(20.32,-1.27) B2(17.78,-3.81) B3(15.24,-1.27) B4(12.7,-3.81) B5(10.16,-1.27) B6(7.62,-3.81) B7(5.08,-1.27) B8(2.54,-3.81) B9(0,-1.27) B10(-2.54,-3.81) B11(-5.08,-1.27) B12(-7.62,-3.81) B13(-10.16,-1.27) B14(-12.7,-3.81) B15(-15.24,-1.27) B16(-17.78,-3.81) B17(-20.32,-1.27)
PG_VG93K_F_G2D111
  round 1.778 hole 0.711: 01(20.32,1.27) 02(17.78,-1.27) 03(15.24,1.27) 04(12.7,-1.27) 05(10.16,1.27) 06(7.62,-1.27) 07(5.08,1.27) 08(2.54,-1.27) 09(0,1.27) 10(-2.54,-1.27) 11(-5.08,1.27) 12(-7.62,-1.27) 13(-10.16,1.27) 14(-12.7,-1.27) 15(-15.24,1.27) 16(-17.78,-1.27) 17(-20.32,1.27)
  rect 1.778x1.778 hole 0.711: A1(20.32,3.81) A2(17.78,1.27) A3(15.24,3.81) A4(12.7,1.27) A5(10.16,3.81) A6(7.62,1.27) A7(5.08,3.81) A8(2.54,1.27) A9(0,3.81) A10(-2.54,1.27) A11(-5.08,3.81) A12(-7.62,1.27) A13(-10.16,3.81) A14(-12.7,1.27) A15(-15.24,3.81) A16(-17.78,1.27) A17(-20.32,3.81) B1(20.32,-1.27) B2(17.78,-3.81) B3(15.24,-1.27) B4(12.7,-3.81) B5(10.16,-1.27) B6(7.62,-3.81) B7(5.08,-1.27) B8(2.54,-3.81) B9(0,-1.27) B10(-2.54,-3.81) B11(-5.08,-1.27) B12(-7.62,-3.81) B13(-10.16,-1.27) B14(-12.7,-3.81) B15(-15.24,-1.27) B16(-17.78,-3.81) B17(-20.32,-1.27)
PG_VG93K_F_G2D112
  round 1.778 hole 0.711: 01(20.32,1.27) 02(17.78,-1.27) 03(15.24,1.27) 04(12.7,-1.27) 05(10.16,1.27) 06(7.62,-1.27) 07(5.08,1.27) 08(2.54,-1.27) 09(0,1.27) 10(-2.54,-1.27) 11(-5.08,1.27) 12(-7.62,-1.27) 13(-10.16,1.27) 14(-12.7,-1.27) 15(-15.24,1.27) 16(-17.78,-1.27) 17(-20.32,1.27)
  rect 1.778x1.778 hole 0.711: A1(20.32,3.81) A2(17.78,1.27) A3(15.24,3.81) A4(12.7,1.27) A5(10.16,3.81) A6(7.62,1.27) A7(5.08,3.81) A8(2.54,1.27) A9(0,3.81) A10(-2.54,1.27) A11(-5.08,3.81) A12(-7.62,1.27) A13(-10.16,3.81) A14(-12.7,1.27) A15(-15.24,3.81) A16(-17.78,1.27) A17(-20.32,3.81) B1(20.32,-1.27) B2(17.78,-3.81) B3(15.24,-1.27) B4(12.7,-3.81) B5(10.16,-1.27) B6(7.62,-3.81) B7(5.08,-1.27) B8(2.54,-3.81) B9(0,-1.27) B10(-2.54,-3.81) B11(-5.08,-1.27) B12(-7.62,-3.81) B13(-10.16,-1.27) B14(-12.7,-3.81) B15(-15.24,-1.27) B16(-17.78,-3.81) B17(-20.32,-1.27)
PG_VG93K_F_G2D113
  round 1.778 hole 0.711: 01(20.32,1.27) 02(17.78,-1.27) 03(15.24,1.27) 04(12.7,-1.27) 05(10.16,1.27) 06(7.62,-1.27) 07(5.08,1.27) 08(2.54,-1.27) 09(0,1.27) 10(-2.54,-1.27) 11(-5.08,1.27) 12(-7.62,-1.27) 13(-10.16,1.27) 14(-12.7,-1.27) 15(-15.24,1.27) 16(-17.78,-1.27) 17(-20.32,1.27)
  rect 1.778x1.778 hole 0.711: A1(20.32,3.81) A2(17.78,1.27) A3(15.24,3.81) A4(12.7,1.27) A5(10.16,3.81) A6(7.62,1.27) A7(5.08,3.81) A8(2.54,1.27) A9(0,3.81) A10(-2.54,1.27) A11(-5.08,3.81) A12(-7.62,1.27) A13(-10.16,3.81) A14(-12.7,1.27) A15(-15.24,3.81) A16(-17.78,1.27) A17(-20.32,3.81) B1(20.32,-1.27) B2(17.78,-3.81) B3(15.24,-1.27) B4(12.7,-3.81) B5(10.16,-1.27) B6(7.62,-3.81) B7(5.08,-1.27) B8(2.54,-3.81) B9(0,-1.27) B10(-2.54,-3.81) B11(-5.08,-1.27) B12(-7.62,-3.81) B13(-10.16,-1.27) B14(-12.7,-3.81) B15(-15.24,-1.27) B16(-17.78,-3.81) B17(-20.32,-1.27)
PG_VG93K_F_G2D114
  round 1.778 hole 0.711: 01(20.32,1.27) 02(17.78,-1.27) 03(15.24,1.27) 04(12.7,-1.27) 05(10.16,1.27) 06(7.62,-1.27) 07(5.08,1.27) 08(2.54,-1.27) 09(0,1.27) 10(-2.54,-1.27) 11(-5.08,1.27) 12(-7.62,-1.27) 13(-10.16,1.27) 14(-12.7,-1.27) 15(-15.24,1.27) 16(-17.78,-1.27) 17(-20.32,1.27)
  rect 1.778x1.778 hole 0.711: A1(20.32,3.81) A2(17.78,1.27) A3(15.24,3.81) A4(12.7,1.27) A5(10.16,3.81) A6(7.62,1.27) A7(5.08,3.81) A8(2.54,1.27) A9(0,3.81) A10(-2.54,1.27) A11(-5.08,3.81) A12(-7.62,1.27) A13(-10.16,3.81) A14(-12.7,1.27) A15(-15.24,3.81) A16(-17.78,1.27) A17(-20.32,3.81) B1(20.32,-1.27) B2(17.78,-3.81) B3(15.24,-1.27) B4(12.7,-3.81) B5(10.16,-1.27) B6(7.62,-3.81) B7(5.08,-1.27) B8(2.54,-3.81) B9(0,-1.27) B10(-2.54,-3.81) B11(-5.08,-1.27) B12(-7.62,-3.81) B13(-10.16,-1.27) B14(-12.7,-3.81) B15(-15.24,-1.27) B16(-17.78,-3.81) B17(-20.32,-1.27)
PG_VG93K_F_G2D115
  round 1.778 hole 0.711: 01(20.32,1.27) 02(17.78,-1.27) 03(15.24,1.27) 04(12.7,-1.27) 05(10.16,1.27) 06(7.62,-1.27) 07(5.08,1.27) 08(2.54,-1.27) 09(0,1.27) 10(-2.54,-1.27) 11(-5.08,1.27) 12(-7.62,-1.27) 13(-10.16,1.27) 14(-12.7,-1.27) 15(-15.24,1.27) 16(-17.78,-1.27) 17(-20.32,1.27)
  rect 1.778x1.778 hole 0.711: A1(20.32,3.81) A2(17.78,1.27) A3(15.24,3.81) A4(12.7,1.27) A5(10.16,3.81) A6(7.62,1.27) A7(5.08,3.81) A8(2.54,1.27) A9(0,3.81) A10(-2.54,1.27) A11(-5.08,3.81) A12(-7.62,1.27) A13(-10.16,3.81) A14(-12.7,1.27) A15(-15.24,3.81) A16(-17.78,1.27) A17(-20.32,3.81) B1(20.32,-1.27) B2(17.78,-3.81) B3(15.24,-1.27) B4(12.7,-3.81) B5(10.16,-1.27) B6(7.62,-3.81) B7(5.08,-1.27) B8(2.54,-3.81) B9(0,-1.27) B10(-2.54,-3.81) B11(-5.08,-1.27) B12(-7.62,-3.81) B13(-10.16,-1.27) B14(-12.7,-3.81) B15(-15.24,-1.27) B16(-17.78,-3.81) B17(-20.32,-1.27)
PG_VG93K_F_G2D116
  round 1.778 hole 0.711: 01(20.32,1.27) 02(17.78,-1.27) 03(15.24,1.27) 04(12.7,-1.27) 05(10.16,1.27) 06(7.62,-1.27) 07(5.08,1.27) 08(2.54,-1.27) 09(0,1.27) 10(-2.54,-1.27) 11(-5.08,1.27) 12(-7.62,-1.27) 13(-10.16,1.27) 14(-12.7,-1.27) 15(-15.24,1.27) 16(-17.78,-1.27) 17(-20.32,1.27)
  rect 1.778x1.778 hole 0.711: A1(20.32,3.81) A2(17.78,1.27) A3(15.24,3.81) A4(12.7,1.27) A5(10.16,3.81) A6(7.62,1.27) A7(5.08,3.81) A8(2.54,1.27) A9(0,3.81) A10(-2.54,1.27) A11(-5.08,3.81) A12(-7.62,1.27) A13(-10.16,3.81) A14(-12.7,1.27) A15(-15.24,3.81) A16(-17.78,1.27) A17(-20.32,3.81) B1(20.32,-1.27) B2(17.78,-3.81) B3(15.24,-1.27) B4(12.7,-3.81) B5(10.16,-1.27) B6(7.62,-3.81) B7(5.08,-1.27) B8(2.54,-3.81) B9(0,-1.27) B10(-2.54,-3.81) B11(-5.08,-1.27) B12(-7.62,-3.81) B13(-10.16,-1.27) B14(-12.7,-3.81) B15(-15.24,-1.27) B16(-17.78,-3.81) B17(-20.32,-1.27)
PG_VG93K_F_G2DPS2
  round 1.778 hole 0.711: A01(20.32,2.54) A02(17.78,2.54) A03(15.24,2.54) A04(12.7,2.54) A05(10.16,2.54) A06(7.62,2.54) A07(5.08,2.54) A08(2.54,2.54) A09(0,2.54) A10(-2.54,2.54) A11(-5.08,2.54) A12(-7.62,2.54) A13(-10.16,2.54) A14(-12.7,2.54) A15(-15.24,2.54) A16(-17.78,2.54) A17(-20.32,2.54) B01(20.32,0) B02(17.78,0) B03(15.24,0) B04(12.7,0) B05(10.16,0) B06(7.62,0) B07(5.08,0) B08(2.54,0) B09(0,0) B10(-2.54,0) B11(-5.08,0) B12(-7.62,0) B13(-10.16,0) B14(-12.7,0) B15(-15.24,0) B16(-17.78,0) B17(-20.32,0) C01(20.32,-2.54) C02(17.78,-2.54) C03(15.24,-2.54) C04(12.7,-2.54) C05(10.16,-2.54) C06(7.62,-2.54) C07(5.08,-2.54) C08(2.54,-2.54) C09(0,-2.54) C10(-2.54,-2.54) C11(-5.08,-2.54) C12(-7.62,-2.54) C13(-10.16,-2.54) C14(-12.7,-2.54) C15(-15.24,-2.54) C16(-17.78,-2.54) C17(-20.32,-2.54)
PG_VG93K_F_G2UTI3
  round 1.778 hole 0.711: A01(20.32,1.27) A02(17.78,1.27) A03(15.24,1.27) A04(12.7,1.27) A05(10.16,1.27) A06(7.62,1.27) A07(5.08,1.27) A08(2.54,1.27) A09(0,1.27) A10(-2.54,1.27) A11(-5.08,1.27) A12(-7.62,1.27) A13(-10.16,1.27) A14(-12.7,1.27) A15(-15.24,1.27) A16(-17.78,1.27) A17(-20.32,1.27) B01(20.32,-1.27) B02(17.78,-1.27) B03(15.24,-1.27) B04(12.7,-1.27) B05(10.16,-1.27) B06(7.62,-1.27) B07(5.08,-1.27) B08(2.54,-1.27) B09(0,-1.27) B10(-2.54,-1.27) B11(-5.08,-1.27) B12(-7.62,-1.27) B13(-10.16,-1.27) B14(-12.7,-1.27) B15(-15.24,-1.27) B16(-17.78,-1.27) B17(-20.32,-1.27)
PG_VG93K_F_G3D119
  round 1.778 hole 0.711: 01(-20.32,-1.27) 02(-17.78,1.27) 03(-15.24,-1.27) 04(-12.7,1.27) 05(-10.16,-1.27) 06(-7.62,1.27) 07(-5.08,-1.27) 08(-2.54,1.27) 09(0,-1.27) 10(2.54,1.27) 11(5.08,-1.27) 12(7.62,1.27) 13(10.16,-1.27) 14(12.7,1.27) 15(15.24,-1.27) 16(17.78,1.27) 17(20.32,-1.27)
  rect 1.778x1.778 hole 0.711: A1(-20.32,-3.81) A2(-17.78,-1.27) A3(-15.24,-3.81) A4(-12.7,-1.27) A5(-10.16,-3.81) A6(-7.62,-1.27) A7(-5.08,-3.81) A8(-2.54,-1.27) A9(0,-3.81) A10(2.54,-1.27) A11(5.08,-3.81) A12(7.62,-1.27) A13(10.16,-3.81) A14(12.7,-1.27) A15(15.24,-3.81) A16(17.78,-1.27) A17(20.32,-3.81) B1(-20.32,1.27) B2(-17.78,3.81) B3(-15.24,1.27) B4(-12.7,3.81) B5(-10.16,1.27) B6(-7.62,3.81) B7(-5.08,1.27) B8(-2.54,3.81) B9(0,1.27) B10(2.54,3.81) B11(5.08,1.27) B12(7.62,3.81) B13(10.16,1.27) B14(12.7,3.81) B15(15.24,1.27) B16(17.78,3.81) B17(20.32,1.27)
PG_VG93K_F_G3D120
  round 1.778 hole 0.711: 01(-20.32,-1.27) 02(-17.78,1.27) 03(-15.24,-1.27) 04(-12.7,1.27) 05(-10.16,-1.27) 06(-7.62,1.27) 07(-5.08,-1.27) 08(-2.54,1.27) 09(0,-1.27) 10(2.54,1.27) 11(5.08,-1.27) 12(7.62,1.27) 13(10.16,-1.27) 14(12.7,1.27) 15(15.24,-1.27) 16(17.78,1.27) 17(20.32,-1.27)
  rect 1.778x1.778 hole 0.711: A1(-20.32,-3.81) A2(-17.78,-1.27) A3(-15.24,-3.81) A4(-12.7,-1.27) A5(-10.16,-3.81) A6(-7.62,-1.27) A7(-5.08,-3.81) A8(-2.54,-1.27) A9(0,-3.81) A10(2.54,-1.27) A11(5.08,-3.81) A12(7.62,-1.27) A13(10.16,-3.81) A14(12.7,-1.27) A15(15.24,-3.81) A16(17.78,-1.27) A17(20.32,-3.81) B1(-20.32,1.27) B2(-17.78,3.81) B3(-15.24,1.27) B4(-12.7,3.81) B5(-10.16,1.27) B6(-7.62,3.81) B7(-5.08,1.27) B8(-2.54,3.81) B9(0,1.27) B10(2.54,3.81) B11(5.08,1.27) B12(7.62,3.81) B13(10.16,1.27) B14(12.7,3.81) B15(15.24,1.27) B16(17.78,3.81) B17(20.32,1.27)
PG_VG93K_F_G3D123
  round 1.778 hole 0.711: 01(-20.32,-1.27) 02(-17.78,1.27) 03(-15.24,-1.27) 04(-12.7,1.27) 05(-10.16,-1.27) 06(-7.62,1.27) 07(-5.08,-1.27) 08(-2.54,1.27) 09(0,-1.27) 10(2.54,1.27) 11(5.08,-1.27) 12(7.62,1.27) 13(10.16,-1.27) 14(12.7,1.27) 15(15.24,-1.27) 16(17.78,1.27) 17(20.32,-1.27)
  rect 1.778x1.778 hole 0.711: A1(-20.32,-3.81) A2(-17.78,-1.27) A3(-15.24,-3.81) A4(-12.7,-1.27) A5(-10.16,-3.81) A6(-7.62,-1.27) A7(-5.08,-3.81) A8(-2.54,-1.27) A9(0,-3.81) A10(2.54,-1.27) A11(5.08,-3.81) A12(7.62,-1.27) A13(10.16,-3.81) A14(12.7,-1.27) A15(15.24,-3.81) A16(17.78,-1.27) A17(20.32,-3.81) B1(-20.32,1.27) B2(-17.78,3.81) B3(-15.24,1.27) B4(-12.7,3.81) B5(-10.16,1.27) B6(-7.62,3.81) B7(-5.08,1.27) B8(-2.54,3.81) B9(0,1.27) B10(2.54,3.81) B11(5.08,1.27) B12(7.62,3.81) B13(10.16,1.27) B14(12.7,3.81) B15(15.24,1.27) B16(17.78,3.81) B17(20.32,1.27)
PG_VG93K_F_G3D124
  round 1.778 hole 0.711: 01(-20.32,-1.27) 02(-17.78,1.27) 03(-15.24,-1.27) 04(-12.7,1.27) 05(-10.16,-1.27) 06(-7.62,1.27) 07(-5.08,-1.27) 08(-2.54,1.27) 09(0,-1.27) 10(2.54,1.27) 11(5.08,-1.27) 12(7.62,1.27) 13(10.16,-1.27) 14(12.7,1.27) 15(15.24,-1.27) 16(17.78,1.27) 17(20.32,-1.27)
  rect 1.778x1.778 hole 0.711: A1(-20.32,-3.81) A2(-17.78,-1.27) A3(-15.24,-3.81) A4(-12.7,-1.27) A5(-10.16,-3.81) A6(-7.62,-1.27) A7(-5.08,-3.81) A8(-2.54,-1.27) A9(0,-3.81) A10(2.54,-1.27) A11(5.08,-3.81) A12(7.62,-1.27) A13(10.16,-3.81) A14(12.7,-1.27) A15(15.24,-3.81) A16(17.78,-1.27) A17(20.32,-3.81) B1(-20.32,1.27) B2(-17.78,3.81) B3(-15.24,1.27) B4(-12.7,3.81) B5(-10.16,1.27) B6(-7.62,3.81) B7(-5.08,1.27) B8(-2.54,3.81) B9(0,1.27) B10(2.54,3.81) B11(5.08,1.27) B12(7.62,3.81) B13(10.16,1.27) B14(12.7,3.81) B15(15.24,1.27) B16(17.78,3.81) B17(20.32,1.27)
PG_VG93K_F_G3D317
  round 1.524 hole 0.711: 01(-20.32,-1.27) 02(-17.78,1.27) 03(-15.24,-1.27) 04(-12.7,1.27) 05(-10.16,-1.27) 06(-7.62,1.27) 07(-5.08,-1.27) 08(-2.54,1.27) 09(0,-1.27) 10(2.54,1.27) 11(5.08,-1.27) 12(7.62,1.27) 13(10.16,-1.27) 14(12.7,1.27) 15(15.24,-1.27) 16(17.78,1.27) 17(20.32,-1.27)
  rect 1.524x1.524 hole 0.711: A1(-20.32,-3.81) A2(-17.78,-1.27) A3(-15.24,-3.81) A4(-12.7,-1.27) A5(-10.16,-3.81) A6(-7.62,-1.27) A7(-5.08,-3.81) A8(-2.54,-1.27) A9(0,-3.81) A10(2.54,-1.27) A11(5.08,-3.81) A12(7.62,-1.27) A13(10.16,-3.81) A14(12.7,-1.27) A15(15.24,-3.81) A16(17.78,-1.27) A17(20.32,-3.81) B1(-20.32,1.27) B2(-17.78,3.81) B3(-15.24,1.27) B4(-12.7,3.81) B5(-10.16,1.27) B6(-7.62,3.81) B7(-5.08,1.27) B8(-2.54,3.81) B9(0,1.27) B10(2.54,3.81) B11(5.08,1.27) B12(7.62,3.81) B13(10.16,1.27) B14(12.7,3.81) B15(15.24,1.27) B16(17.78,3.81) B17(20.32,1.27)
PG_VG93K_F_G3D318
  round 1.524 hole 0.711: 01(-20.32,-1.27) 02(-17.78,1.27) 03(-15.24,-1.27) 04(-12.7,1.27) 05(-10.16,-1.27) 06(-7.62,1.27) 07(-5.08,-1.27) 08(-2.54,1.27) 09(0,-1.27) 10(2.54,1.27) 11(5.08,-1.27) 12(7.62,1.27) 13(10.16,-1.27) 14(12.7,1.27) 15(15.24,-1.27) 16(17.78,1.27) 17(20.32,-1.27)
  rect 1.524x1.524 hole 0.711: A1(-20.32,-3.81) A2(-17.78,-1.27) A3(-15.24,-3.81) A4(-12.7,-1.27) A5(-10.16,-3.81) A6(-7.62,-1.27) A7(-5.08,-3.81) A8(-2.54,-1.27) A9(0,-3.81) A10(2.54,-1.27) A11(5.08,-3.81) A12(7.62,-1.27) A13(10.16,-3.81) A14(12.7,-1.27) A15(15.24,-3.81) A16(17.78,-1.27) A17(20.32,-3.81) B1(-20.32,1.27) B2(-17.78,3.81) B3(-15.24,1.27) B4(-12.7,3.81) B5(-10.16,1.27) B6(-7.62,3.81) B7(-5.08,1.27) B8(-2.54,3.81) B9(0,1.27) B10(2.54,3.81) B11(5.08,1.27) B12(7.62,3.81) B13(10.16,1.27) B14(12.7,3.81) B15(15.24,1.27) B16(17.78,3.81) B17(20.32,1.27)
PG_VG93K_F_G3D321
  round 1.524 hole 0.711: 01(-20.32,-1.27) 02(-17.78,1.27) 03(-15.24,-1.27) 04(-12.7,1.27) 05(-10.16,-1.27) 06(-7.62,1.27) 07(-5.08,-1.27) 08(-2.54,1.27) 09(0,-1.27) 10(2.54,1.27) 11(5.08,-1.27) 12(7.62,1.27) 13(10.16,-1.27) 14(12.7,1.27) 15(15.24,-1.27) 16(17.78,1.27) 17(20.32,-1.27)
  rect 1.524x1.524 hole 0.711: A1(-20.32,-3.81) A2(-17.78,-1.27) A3(-15.24,-3.81) A4(-12.7,-1.27) A5(-10.16,-3.81) A6(-7.62,-1.27) A7(-5.08,-3.81) A8(-2.54,-1.27) A9(0,-3.81) A10(2.54,-1.27) A11(5.08,-3.81) A12(7.62,-1.27) A13(10.16,-3.81) A14(12.7,-1.27) A15(15.24,-3.81) A16(17.78,-1.27) A17(20.32,-3.81) B1(-20.32,1.27) B2(-17.78,3.81) B3(-15.24,1.27) B4(-12.7,3.81) B5(-10.16,1.27) B6(-7.62,3.81) B7(-5.08,1.27) B8(-2.54,3.81) B9(0,1.27) B10(2.54,3.81) B11(5.08,1.27) B12(7.62,3.81) B13(10.16,1.27) B14(12.7,3.81) B15(15.24,1.27) B16(17.78,3.81) B17(20.32,1.27)
PG_VG93K_F_G3D322
  round 1.524 hole 0.711: 01(-20.32,-1.27) 02(-17.78,1.27) 03(-15.24,-1.27) 04(-12.7,1.27) 05(-10.16,-1.27) 06(-7.62,1.27) 07(-5.08,-1.27) 08(-2.54,1.27) 09(0,-1.27) 10(2.54,1.27) 11(5.08,-1.27) 12(7.62,1.27) 13(10.16,-1.27) 14(12.7,1.27) 15(15.24,-1.27) 16(17.78,1.27) 17(20.32,-1.27)
  rect 1.524x1.524 hole 0.711: A1(-20.32,-3.81) A2(-17.78,-1.27) A3(-15.24,-3.81) A4(-12.7,-1.27) A5(-10.16,-3.81) A6(-7.62,-1.27) A7(-5.08,-3.81) A8(-2.54,-1.27) A9(0,-3.81) A10(2.54,-1.27) A11(5.08,-3.81) A12(7.62,-1.27) A13(10.16,-3.81) A14(12.7,-1.27) A15(15.24,-3.81) A16(17.78,-1.27) A17(20.32,-3.81) B1(-20.32,1.27) B2(-17.78,3.81) B3(-15.24,1.27) B4(-12.7,3.81) B5(-10.16,1.27) B6(-7.62,3.81) B7(-5.08,1.27) B8(-2.54,3.81) B9(0,1.27) B10(2.54,3.81) B11(5.08,1.27) B12(7.62,3.81) B13(10.16,1.27) B14(12.7,3.81) B15(15.24,1.27) B16(17.78,3.81) B17(20.32,1.27)
PG_VG93K_F_G3DPS3
  round 1.778 hole 0.711: A01(-20.32,-2.54) A02(-17.78,-2.54) A03(-15.24,-2.54) A04(-12.7,-2.54) A05(-10.16,-2.54) A06(-7.62,-2.54) A07(-5.08,-2.54) A08(-2.54,-2.54) A09(0,-2.54) A10(2.54,-2.54) A11(5.08,-2.54) A12(7.62,-2.54) A13(10.16,-2.54) A14(12.7,-2.54) A15(15.24,-2.54) A16(17.78,-2.54) A17(20.32,-2.54) B01(-20.32,0) B02(-17.78,0) B03(-15.24,0) B04(-12.7,0) B05(-10.16,0) B06(-7.62,0) B07(-5.08,0) B08(-2.54,0) B09(0,0) B10(2.54,0) B11(5.08,0) B12(7.62,0) B13(10.16,0) B14(12.7,0) B15(15.24,0) B16(17.78,0) B17(20.32,0) C01(-20.32,2.54) C02(-17.78,2.54) C03(-15.24,2.54) C04(-12.7,2.54) C05(-10.16,2.54) C06(-7.62,2.54) C07(-5.08,2.54) C08(-2.54,2.54) C09(0,2.54) C10(2.54,2.54) C11(5.08,2.54) C12(7.62,2.54) C13(10.16,2.54) C14(12.7,2.54) C15(15.24,2.54) C16(17.78,2.54) C17(20.32,2.54)
PG_VG93K_F_G3UTI1
  round 1.778 hole 0.711: A01(-20.32,-1.27) A02(-17.78,-1.27) A03(-15.24,-1.27) A04(-12.7,-1.27) A05(-10.16,-1.27) A06(-7.62,-1.27) A07(-5.08,-1.27) A08(-2.54,-1.27) A09(0,-1.27) A10(2.54,-1.27) A11(5.08,-1.27) A12(7.62,-1.27) A13(10.16,-1.27) A14(12.7,-1.27) A15(15.24,-1.27) A16(17.78,-1.27) A17(20.32,-1.27) B01(-20.32,1.27) B02(-17.78,1.27) B03(-15.24,1.27) B04(-12.7,1.27) B05(-10.16,1.27) B06(-7.62,1.27) B07(-5.08,1.27) B08(-2.54,1.27) B09(0,1.27) B10(2.54,1.27) B11(5.08,1.27) B12(7.62,1.27) B13(10.16,1.27) B14(12.7,1.27) B15(15.24,1.27) B16(17.78,1.27) B17(20.32,1.27)
PG_VG93K_F_G4D125
  round 1.778 hole 0.711: 01(-20.32,-1.27) 02(-17.78,1.27) 03(-15.24,-1.27) 04(-12.7,1.27) 05(-10.16,-1.27) 06(-7.62,1.27) 07(-5.08,-1.27) 08(-2.54,1.27) 09(0,-1.27) 10(2.54,1.27) 11(5.08,-1.27) 12(7.62,1.27) 13(10.16,-1.27) 14(12.7,1.27) 15(15.24,-1.27) 16(17.78,1.27) 17(20.32,-1.27)
  rect 1.778x1.778 hole 0.711: A1(-20.32,-3.81) A2(-17.78,-1.27) A3(-15.24,-3.81) A4(-12.7,-1.27) A5(-10.16,-3.81) A6(-7.62,-1.27) A7(-5.08,-3.81) A8(-2.54,-1.27) A9(0,-3.81) A10(2.54,-1.27) A11(5.08,-3.81) A12(7.62,-1.27) A13(10.16,-3.81) A14(12.7,-1.27) A15(15.24,-3.81) A16(17.78,-1.27) A17(20.32,-3.81) B1(-20.32,1.27) B2(-17.78,3.81) B3(-15.24,1.27) B4(-12.7,3.81) B5(-10.16,1.27) B6(-7.62,3.81) B7(-5.08,1.27) B8(-2.54,3.81) B9(0,1.27) B10(2.54,3.81) B11(5.08,1.27) B12(7.62,3.81) B13(10.16,1.27) B14(12.7,3.81) B15(15.24,1.27) B16(17.78,3.81) B17(20.32,1.27)
PG_VG93K_F_G4D126
  round 1.778 hole 0.711: 01(-20.32,-1.27) 02(-17.78,1.27) 03(-15.24,-1.27) 04(-12.7,1.27) 05(-10.16,-1.27) 06(-7.62,1.27) 07(-5.08,-1.27) 08(-2.54,1.27) 09(0,-1.27) 10(2.54,1.27) 11(5.08,-1.27) 12(7.62,1.27) 13(10.16,-1.27) 14(12.7,1.27) 15(15.24,-1.27) 16(17.78,1.27) 17(20.32,-1.27)
  rect 1.778x1.778 hole 0.711: A1(-20.32,-3.81) A2(-17.78,-1.27) A3(-15.24,-3.81) A4(-12.7,-1.27) A5(-10.16,-3.81) A6(-7.62,-1.27) A7(-5.08,-3.81) A8(-2.54,-1.27) A9(0,-3.81) A10(2.54,-1.27) A11(5.08,-3.81) A12(7.62,-1.27) A13(10.16,-3.81) A14(12.7,-1.27) A15(15.24,-3.81) A16(17.78,-1.27) A17(20.32,-3.81) B1(-20.32,1.27) B2(-17.78,3.81) B3(-15.24,1.27) B4(-12.7,3.81) B5(-10.16,1.27) B6(-7.62,3.81) B7(-5.08,1.27) B8(-2.54,3.81) B9(0,1.27) B10(2.54,3.81) B11(5.08,1.27) B12(7.62,3.81) B13(10.16,1.27) B14(12.7,3.81) B15(15.24,1.27) B16(17.78,3.81) B17(20.32,1.27)
PG_VG93K_F_G4D127
  round 1.778 hole 0.711: 01(-20.32,-1.27) 02(-17.78,1.27) 03(-15.24,-1.27) 04(-12.7,1.27) 05(-10.16,-1.27) 06(-7.62,1.27) 07(-5.08,-1.27) 08(-2.54,1.27) 09(0,-1.27) 10(2.54,1.27) 11(5.08,-1.27) 12(7.62,1.27) 13(10.16,-1.27) 14(12.7,1.27) 15(15.24,-1.27) 16(17.78,1.27) 17(20.32,-1.27)
  rect 1.778x1.778 hole 0.711: A1(-20.32,-3.81) A2(-17.78,-1.27) A3(-15.24,-3.81) A4(-12.7,-1.27) A5(-10.16,-3.81) A6(-7.62,-1.27) A7(-5.08,-3.81) A8(-2.54,-1.27) A9(0,-3.81) A10(2.54,-1.27) A11(5.08,-3.81) A12(7.62,-1.27) A13(10.16,-3.81) A14(12.7,-1.27) A15(15.24,-3.81) A16(17.78,-1.27) A17(20.32,-3.81) B1(-20.32,1.27) B2(-17.78,3.81) B3(-15.24,1.27) B4(-12.7,3.81) B5(-10.16,1.27) B6(-7.62,3.81) B7(-5.08,1.27) B8(-2.54,3.81) B9(0,1.27) B10(2.54,3.81) B11(5.08,1.27) B12(7.62,3.81) B13(10.16,1.27) B14(12.7,3.81) B15(15.24,1.27) B16(17.78,3.81) B17(20.32,1.27)
PG_VG93K_F_G4D128
  round 1.778 hole 0.711: 01(-20.32,-1.27) 02(-17.78,1.27) 03(-15.24,-1.27) 04(-12.7,1.27) 05(-10.16,-1.27) 06(-7.62,1.27) 07(-5.08,-1.27) 08(-2.54,1.27) 09(0,-1.27) 10(2.54,1.27) 11(5.08,-1.27) 12(7.62,1.27) 13(10.16,-1.27) 14(12.7,1.27) 15(15.24,-1.27) 16(17.78,1.27) 17(20.32,-1.27)
  rect 1.778x1.778 hole 0.711: A1(-20.32,-3.81) A2(-17.78,-1.27) A3(-15.24,-3.81) A4(-12.7,-1.27) A5(-10.16,-3.81) A6(-7.62,-1.27) A7(-5.08,-3.81) A8(-2.54,-1.27) A9(0,-3.81) A10(2.54,-1.27) A11(5.08,-3.81) A12(7.62,-1.27) A13(10.16,-3.81) A14(12.7,-1.27) A15(15.24,-3.81) A16(17.78,-1.27) A17(20.32,-3.81) B1(-20.32,1.27) B2(-17.78,3.81) B3(-15.24,1.27) B4(-12.7,3.81) B5(-10.16,1.27) B6(-7.62,3.81) B7(-5.08,1.27) B8(-2.54,3.81) B9(0,1.27) B10(2.54,3.81) B11(5.08,1.27) B12(7.62,3.81) B13(10.16,1.27) B14(12.7,3.81) B15(15.24,1.27) B16(17.78,3.81) B17(20.32,1.27)
PG_VG93K_F_G4D129
  round 1.778 hole 0.711: 01(-20.32,-1.27) 02(-17.78,1.27) 03(-15.24,-1.27) 04(-12.7,1.27) 05(-10.16,-1.27) 06(-7.62,1.27) 07(-5.08,-1.27) 08(-2.54,1.27) 09(0,-1.27) 10(2.54,1.27) 11(5.08,-1.27) 12(7.62,1.27) 13(10.16,-1.27) 14(12.7,1.27) 15(15.24,-1.27) 16(17.78,1.27) 17(20.32,-1.27)
  rect 1.778x1.778 hole 0.711: A1(-20.32,-3.81) A2(-17.78,-1.27) A3(-15.24,-3.81) A4(-12.7,-1.27) A5(-10.16,-3.81) A6(-7.62,-1.27) A7(-5.08,-3.81) A8(-2.54,-1.27) A9(0,-3.81) A10(2.54,-1.27) A11(5.08,-3.81) A12(7.62,-1.27) A13(10.16,-3.81) A14(12.7,-1.27) A15(15.24,-3.81) A16(17.78,-1.27) A17(20.32,-3.81) B1(-20.32,1.27) B2(-17.78,3.81) B3(-15.24,1.27) B4(-12.7,3.81) B5(-10.16,1.27) B6(-7.62,3.81) B7(-5.08,1.27) B8(-2.54,3.81) B9(0,1.27) B10(2.54,3.81) B11(5.08,1.27) B12(7.62,3.81) B13(10.16,1.27) B14(12.7,3.81) B15(15.24,1.27) B16(17.78,3.81) B17(20.32,1.27)
PG_VG93K_F_G4D130
  round 1.778 hole 0.711: 01(-20.32,-1.27) 02(-17.78,1.27) 03(-15.24,-1.27) 04(-12.7,1.27) 05(-10.16,-1.27) 06(-7.62,1.27) 07(-5.08,-1.27) 08(-2.54,1.27) 09(0,-1.27) 10(2.54,1.27) 11(5.08,-1.27) 12(7.62,1.27) 13(10.16,-1.27) 14(12.7,1.27) 15(15.24,-1.27) 16(17.78,1.27) 17(20.32,-1.27)
  rect 1.778x1.778 hole 0.711: A1(-20.32,-3.81) A2(-17.78,-1.27) A3(-15.24,-3.81) A4(-12.7,-1.27) A5(-10.16,-3.81) A6(-7.62,-1.27) A7(-5.08,-3.81) A8(-2.54,-1.27) A9(0,-3.81) A10(2.54,-1.27) A11(5.08,-3.81) A12(7.62,-1.27) A13(10.16,-3.81) A14(12.7,-1.27) A15(15.24,-3.81) A16(17.78,-1.27) A17(20.32,-3.81) B1(-20.32,1.27) B2(-17.78,3.81) B3(-15.24,1.27) B4(-12.7,3.81) B5(-10.16,1.27) B6(-7.62,3.81) B7(-5.08,1.27) B8(-2.54,3.81) B9(0,1.27) B10(2.54,3.81) B11(5.08,1.27) B12(7.62,3.81) B13(10.16,1.27) B14(12.7,3.81) B15(15.24,1.27) B16(17.78,3.81) B17(20.32,1.27)
PG_VG93K_F_G4D131
  round 1.778 hole 0.711: 01(-20.32,-1.27) 02(-17.78,1.27) 03(-15.24,-1.27) 04(-12.7,1.27) 05(-10.16,-1.27) 06(-7.62,1.27) 07(-5.08,-1.27) 08(-2.54,1.27) 09(0,-1.27) 10(2.54,1.27) 11(5.08,-1.27) 12(7.62,1.27) 13(10.16,-1.27) 14(12.7,1.27) 15(15.24,-1.27) 16(17.78,1.27) 17(20.32,-1.27)
  rect 1.778x1.778 hole 0.711: A1(-20.32,-3.81) A2(-17.78,-1.27) A3(-15.24,-3.81) A4(-12.7,-1.27) A5(-10.16,-3.81) A6(-7.62,-1.27) A7(-5.08,-3.81) A8(-2.54,-1.27) A9(0,-3.81) A10(2.54,-1.27) A11(5.08,-3.81) A12(7.62,-1.27) A13(10.16,-3.81) A14(12.7,-1.27) A15(15.24,-3.81) A16(17.78,-1.27) A17(20.32,-3.81) B1(-20.32,1.27) B2(-17.78,3.81) B3(-15.24,1.27) B4(-12.7,3.81) B5(-10.16,1.27) B6(-7.62,3.81) B7(-5.08,1.27) B8(-2.54,3.81) B9(0,1.27) B10(2.54,3.81) B11(5.08,1.27) B12(7.62,3.81) B13(10.16,1.27) B14(12.7,3.81) B15(15.24,1.27) B16(17.78,3.81) B17(20.32,1.27)
PG_VG93K_F_G4D132
  round 1.778 hole 0.711: 01(-20.32,-1.27) 02(-17.78,1.27) 03(-15.24,-1.27) 04(-12.7,1.27) 05(-10.16,-1.27) 06(-7.62,1.27) 07(-5.08,-1.27) 08(-2.54,1.27) 09(0,-1.27) 10(2.54,1.27) 11(5.08,-1.27) 12(7.62,1.27) 13(10.16,-1.27) 14(12.7,1.27) 15(15.24,-1.27) 16(17.78,1.27) 17(20.32,-1.27)
  rect 1.778x1.778 hole 0.711: A1(-20.32,-3.81) A2(-17.78,-1.27) A3(-15.24,-3.81) A4(-12.7,-1.27) A5(-10.16,-3.81) A6(-7.62,-1.27) A7(-5.08,-3.81) A8(-2.54,-1.27) A9(0,-3.81) A10(2.54,-1.27) A11(5.08,-3.81) A12(7.62,-1.27) A13(10.16,-3.81) A14(12.7,-1.27) A15(15.24,-3.81) A16(17.78,-1.27) A17(20.32,-3.81) B1(-20.32,1.27) B2(-17.78,3.81) B3(-15.24,1.27) B4(-12.7,3.81) B5(-10.16,1.27) B6(-7.62,3.81) B7(-5.08,1.27) B8(-2.54,3.81) B9(0,1.27) B10(2.54,3.81) B11(5.08,1.27) B12(7.62,3.81) B13(10.16,1.27) B14(12.7,3.81) B15(15.24,1.27) B16(17.78,3.81) B17(20.32,1.27)
PG_VG93K_F_G4DPS4
  round 1.778 hole 0.711: A01(-20.32,-2.54) A02(-17.78,-2.54) A03(-15.24,-2.54) A04(-12.7,-2.54) A05(-10.16,-2.54) A06(-7.62,-2.54) A07(-5.08,-2.54) A08(-2.54,-2.54) A09(0,-2.54) A10(2.54,-2.54) A11(5.08,-2.54) A12(7.62,-2.54) A13(10.16,-2.54) A14(12.7,-2.54) A15(15.24,-2.54) A16(17.78,-2.54) A17(20.32,-2.54) B01(-20.32,0) B02(-17.78,0) B03(-15.24,0) B04(-12.7,0) B05(-10.16,0) B06(-7.62,0) B07(-5.08,0) B08(-2.54,0) B09(0,0) B10(2.54,0) B11(5.08,0) B12(7.62,0) B13(10.16,0) B14(12.7,0) B15(15.24,0) B16(17.78,0) B17(20.32,0) C01(-20.32,2.54) C02(-17.78,2.54) C03(-15.24,2.54) C04(-12.7,2.54) C05(-10.16,2.54) C06(-7.62,2.54) C07(-5.08,2.54) C08(-2.54,2.54) C09(0,2.54) C10(2.54,2.54) C11(5.08,2.54) C12(7.62,2.54) C13(10.16,2.54) C14(12.7,2.54) C15(15.24,2.54) C16(17.78,2.54) C17(20.32,2.54)
PG_VG93K_F_G4UTI5
  round 1.778 hole 0.711: A01(-20.32,-1.27) A02(-17.78,-1.27) A03(-15.24,-1.27) A04(-12.7,-1.27) A05(-10.16,-1.27) A06(-7.62,-1.27) A07(-5.08,-1.27) A08(-2.54,-1.27) A09(0,-1.27) A10(2.54,-1.27) A11(5.08,-1.27) A12(7.62,-1.27) A13(10.16,-1.27) A14(12.7,-1.27) A15(15.24,-1.27) A16(17.78,-1.27) A17(20.32,-1.27) B01(-20.32,1.27) B02(-17.78,1.27) B03(-15.24,1.27) B04(-12.7,1.27) B05(-10.16,1.27) B06(-7.62,1.27) B07(-5.08,1.27) B08(-2.54,1.27) B09(0,1.27) B10(2.54,1.27) B11(5.08,1.27) B12(7.62,1.27) B13(10.16,1.27) B14(12.7,1.27) B15(15.24,1.27) B16(17.78,1.27) B17(20.32,1.27)
PG_VG93K_F_G5D201
  round 1.778 hole 0.711: 01(-20.32,-1.27) 02(-17.78,1.27) 03(-15.24,-1.27) 04(-12.7,1.27) 05(-10.16,-1.27) 06(-7.62,1.27) 07(-5.08,-1.27) 08(-2.54,1.27) 09(0,-1.27) 10(2.54,1.27) 11(5.08,-1.27) 12(7.62,1.27) 13(10.16,-1.27) 14(12.7,1.27) 15(15.24,-1.27) 16(17.78,1.27) 17(20.32,-1.27)
  rect 1.778x1.778 hole 0.711: A1(-20.32,-3.81) A2(-17.78,-1.27) A3(-15.24,-3.81) A4(-12.7,-1.27) A5(-10.16,-3.81) A6(-7.62,-1.27) A7(-5.08,-3.81) A8(-2.54,-1.27) A9(0,-3.81) A10(2.54,-1.27) A11(5.08,-3.81) A12(7.62,-1.27) A13(10.16,-3.81) A14(12.7,-1.27) A15(15.24,-3.81) A16(17.78,-1.27) A17(20.32,-3.81) B1(-20.32,1.27) B2(-17.78,3.81) B3(-15.24,1.27) B4(-12.7,3.81) B5(-10.16,1.27) B6(-7.62,3.81) B7(-5.08,1.27) B8(-2.54,3.81) B9(0,1.27) B10(2.54,3.81) B11(5.08,1.27) B12(7.62,3.81) B13(10.16,1.27) B14(12.7,3.81) B15(15.24,1.27) B16(17.78,3.81) B17(20.32,1.27)
PG_VG93K_F_G5D202
  round 1.778 hole 0.711: 01(-20.32,-1.27) 02(-17.78,1.27) 03(-15.24,-1.27) 04(-12.7,1.27) 05(-10.16,-1.27) 06(-7.62,1.27) 07(-5.08,-1.27) 08(-2.54,1.27) 09(0,-1.27) 10(2.54,1.27) 11(5.08,-1.27) 12(7.62,1.27) 13(10.16,-1.27) 14(12.7,1.27) 15(15.24,-1.27) 16(17.78,1.27) 17(20.32,-1.27)
  rect 1.778x1.778 hole 0.711: A1(-20.32,-3.81) A2(-17.78,-1.27) A3(-15.24,-3.81) A4(-12.7,-1.27) A5(-10.16,-3.81) A6(-7.62,-1.27) A7(-5.08,-3.81) A8(-2.54,-1.27) A9(0,-3.81) A10(2.54,-1.27) A11(5.08,-3.81) A12(7.62,-1.27) A13(10.16,-3.81) A14(12.7,-1.27) A15(15.24,-3.81) A16(17.78,-1.27) A17(20.32,-3.81) B1(-20.32,1.27) B2(-17.78,3.81) B3(-15.24,1.27) B4(-12.7,3.81) B5(-10.16,1.27) B6(-7.62,3.81) B7(-5.08,1.27) B8(-2.54,3.81) B9(0,1.27) B10(2.54,3.81) B11(5.08,1.27) B12(7.62,3.81) B13(10.16,1.27) B14(12.7,3.81) B15(15.24,1.27) B16(17.78,3.81) B17(20.32,1.27)
PG_VG93K_F_G5D203
  round 1.778 hole 0.711: 01(-20.32,-1.27) 02(-17.78,1.27) 03(-15.24,-1.27) 04(-12.7,1.27) 05(-10.16,-1.27) 06(-7.62,1.27) 07(-5.08,-1.27) 08(-2.54,1.27) 09(0,-1.27) 10(2.54,1.27) 11(5.08,-1.27) 12(7.62,1.27) 13(10.16,-1.27) 14(12.7,1.27) 15(15.24,-1.27) 16(17.78,1.27) 17(20.32,-1.27)
  rect 1.778x1.778 hole 0.711: A1(-20.32,-3.81) A2(-17.78,-1.27) A3(-15.24,-3.81) A4(-12.7,-1.27) A5(-10.16,-3.81) A6(-7.62,-1.27) A7(-5.08,-3.81) A8(-2.54,-1.27) A9(0,-3.81) A10(2.54,-1.27) A11(5.08,-3.81) A12(7.62,-1.27) A13(10.16,-3.81) A14(12.7,-1.27) A15(15.24,-3.81) A16(17.78,-1.27) A17(20.32,-3.81) B1(-20.32,1.27) B2(-17.78,3.81) B3(-15.24,1.27) B4(-12.7,3.81) B5(-10.16,1.27) B6(-7.62,3.81) B7(-5.08,1.27) B8(-2.54,3.81) B9(0,1.27) B10(2.54,3.81) B11(5.08,1.27) B12(7.62,3.81) B13(10.16,1.27) B14(12.7,3.81) B15(15.24,1.27) B16(17.78,3.81) B17(20.32,1.27)
